# Altium PCB ARU8113 Testboard_V0.1.PcbDoc (part 1 of 3)
Units mil, origin at the board's own origin, x right, y up, seen from the top; angles counter-clockwise.
Board outline 6377.95 x 5157.48 mil, 4 copper layers (Top, PWR, GND, Bottom), stack 62.992 mil thick; 518 components, 350 nets, 1764 pads, 749 vias.
Unrouted connection lines stored in the file: 230.
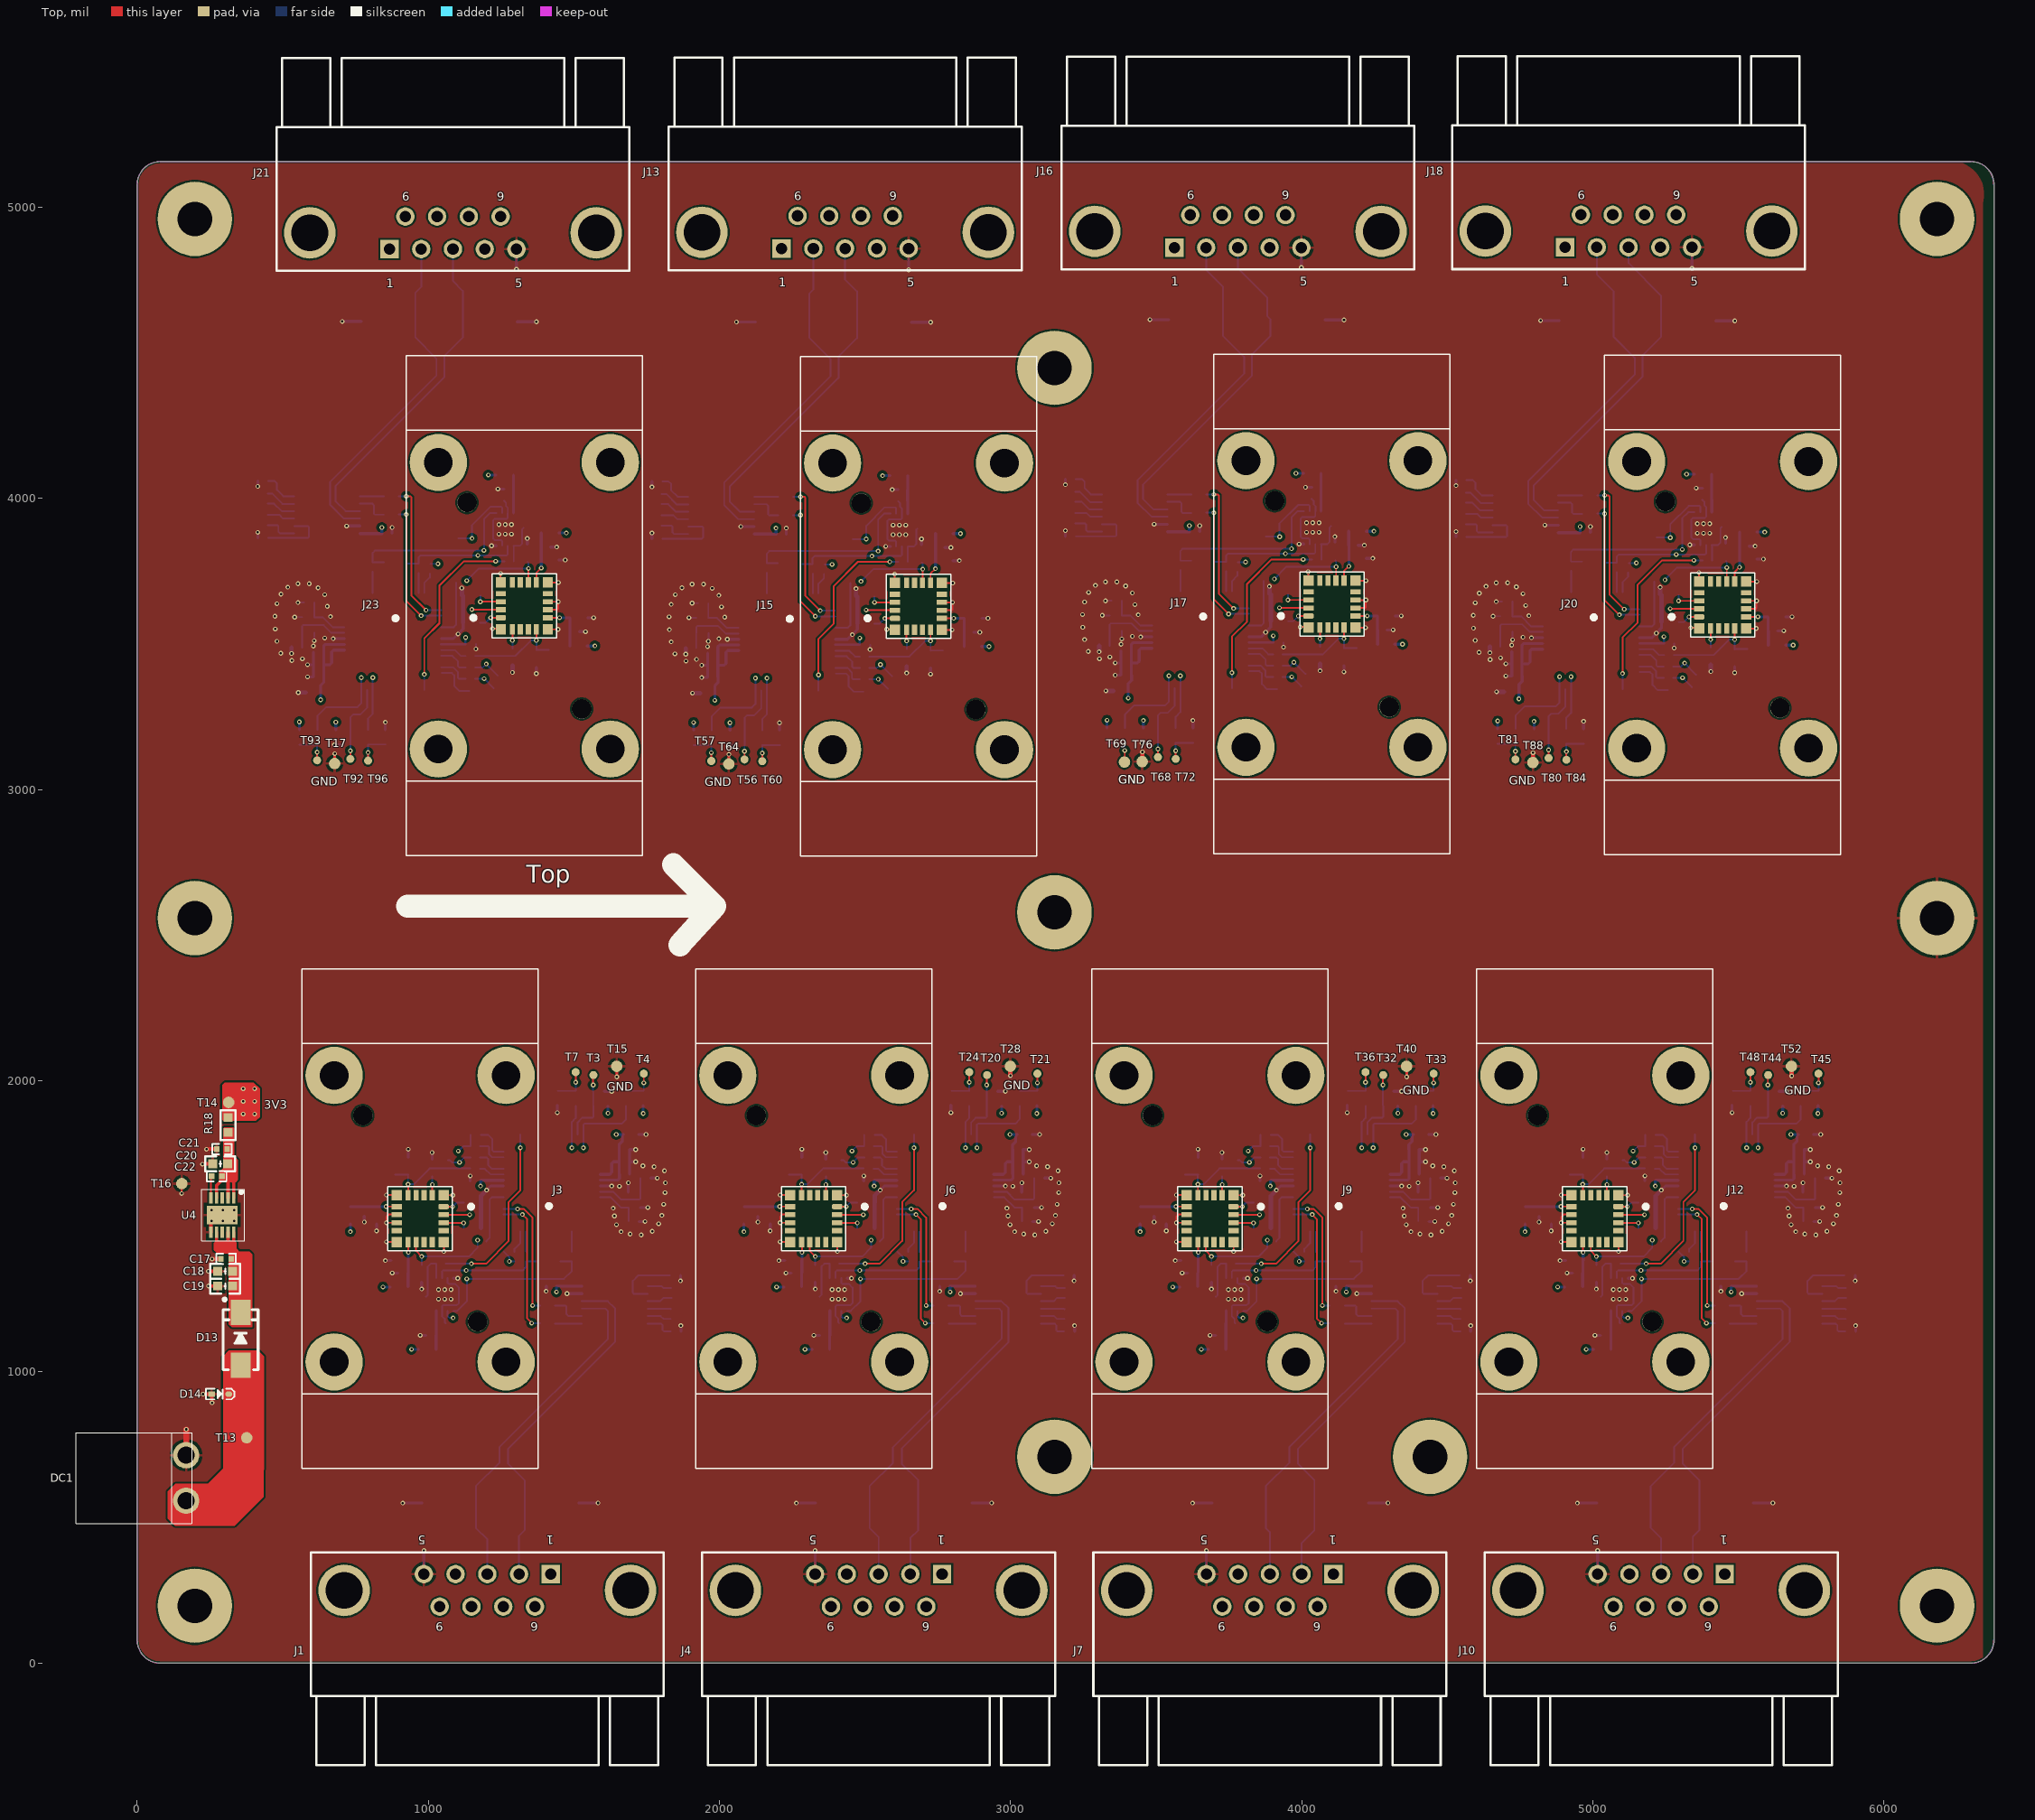
[diagram p0: Top view]
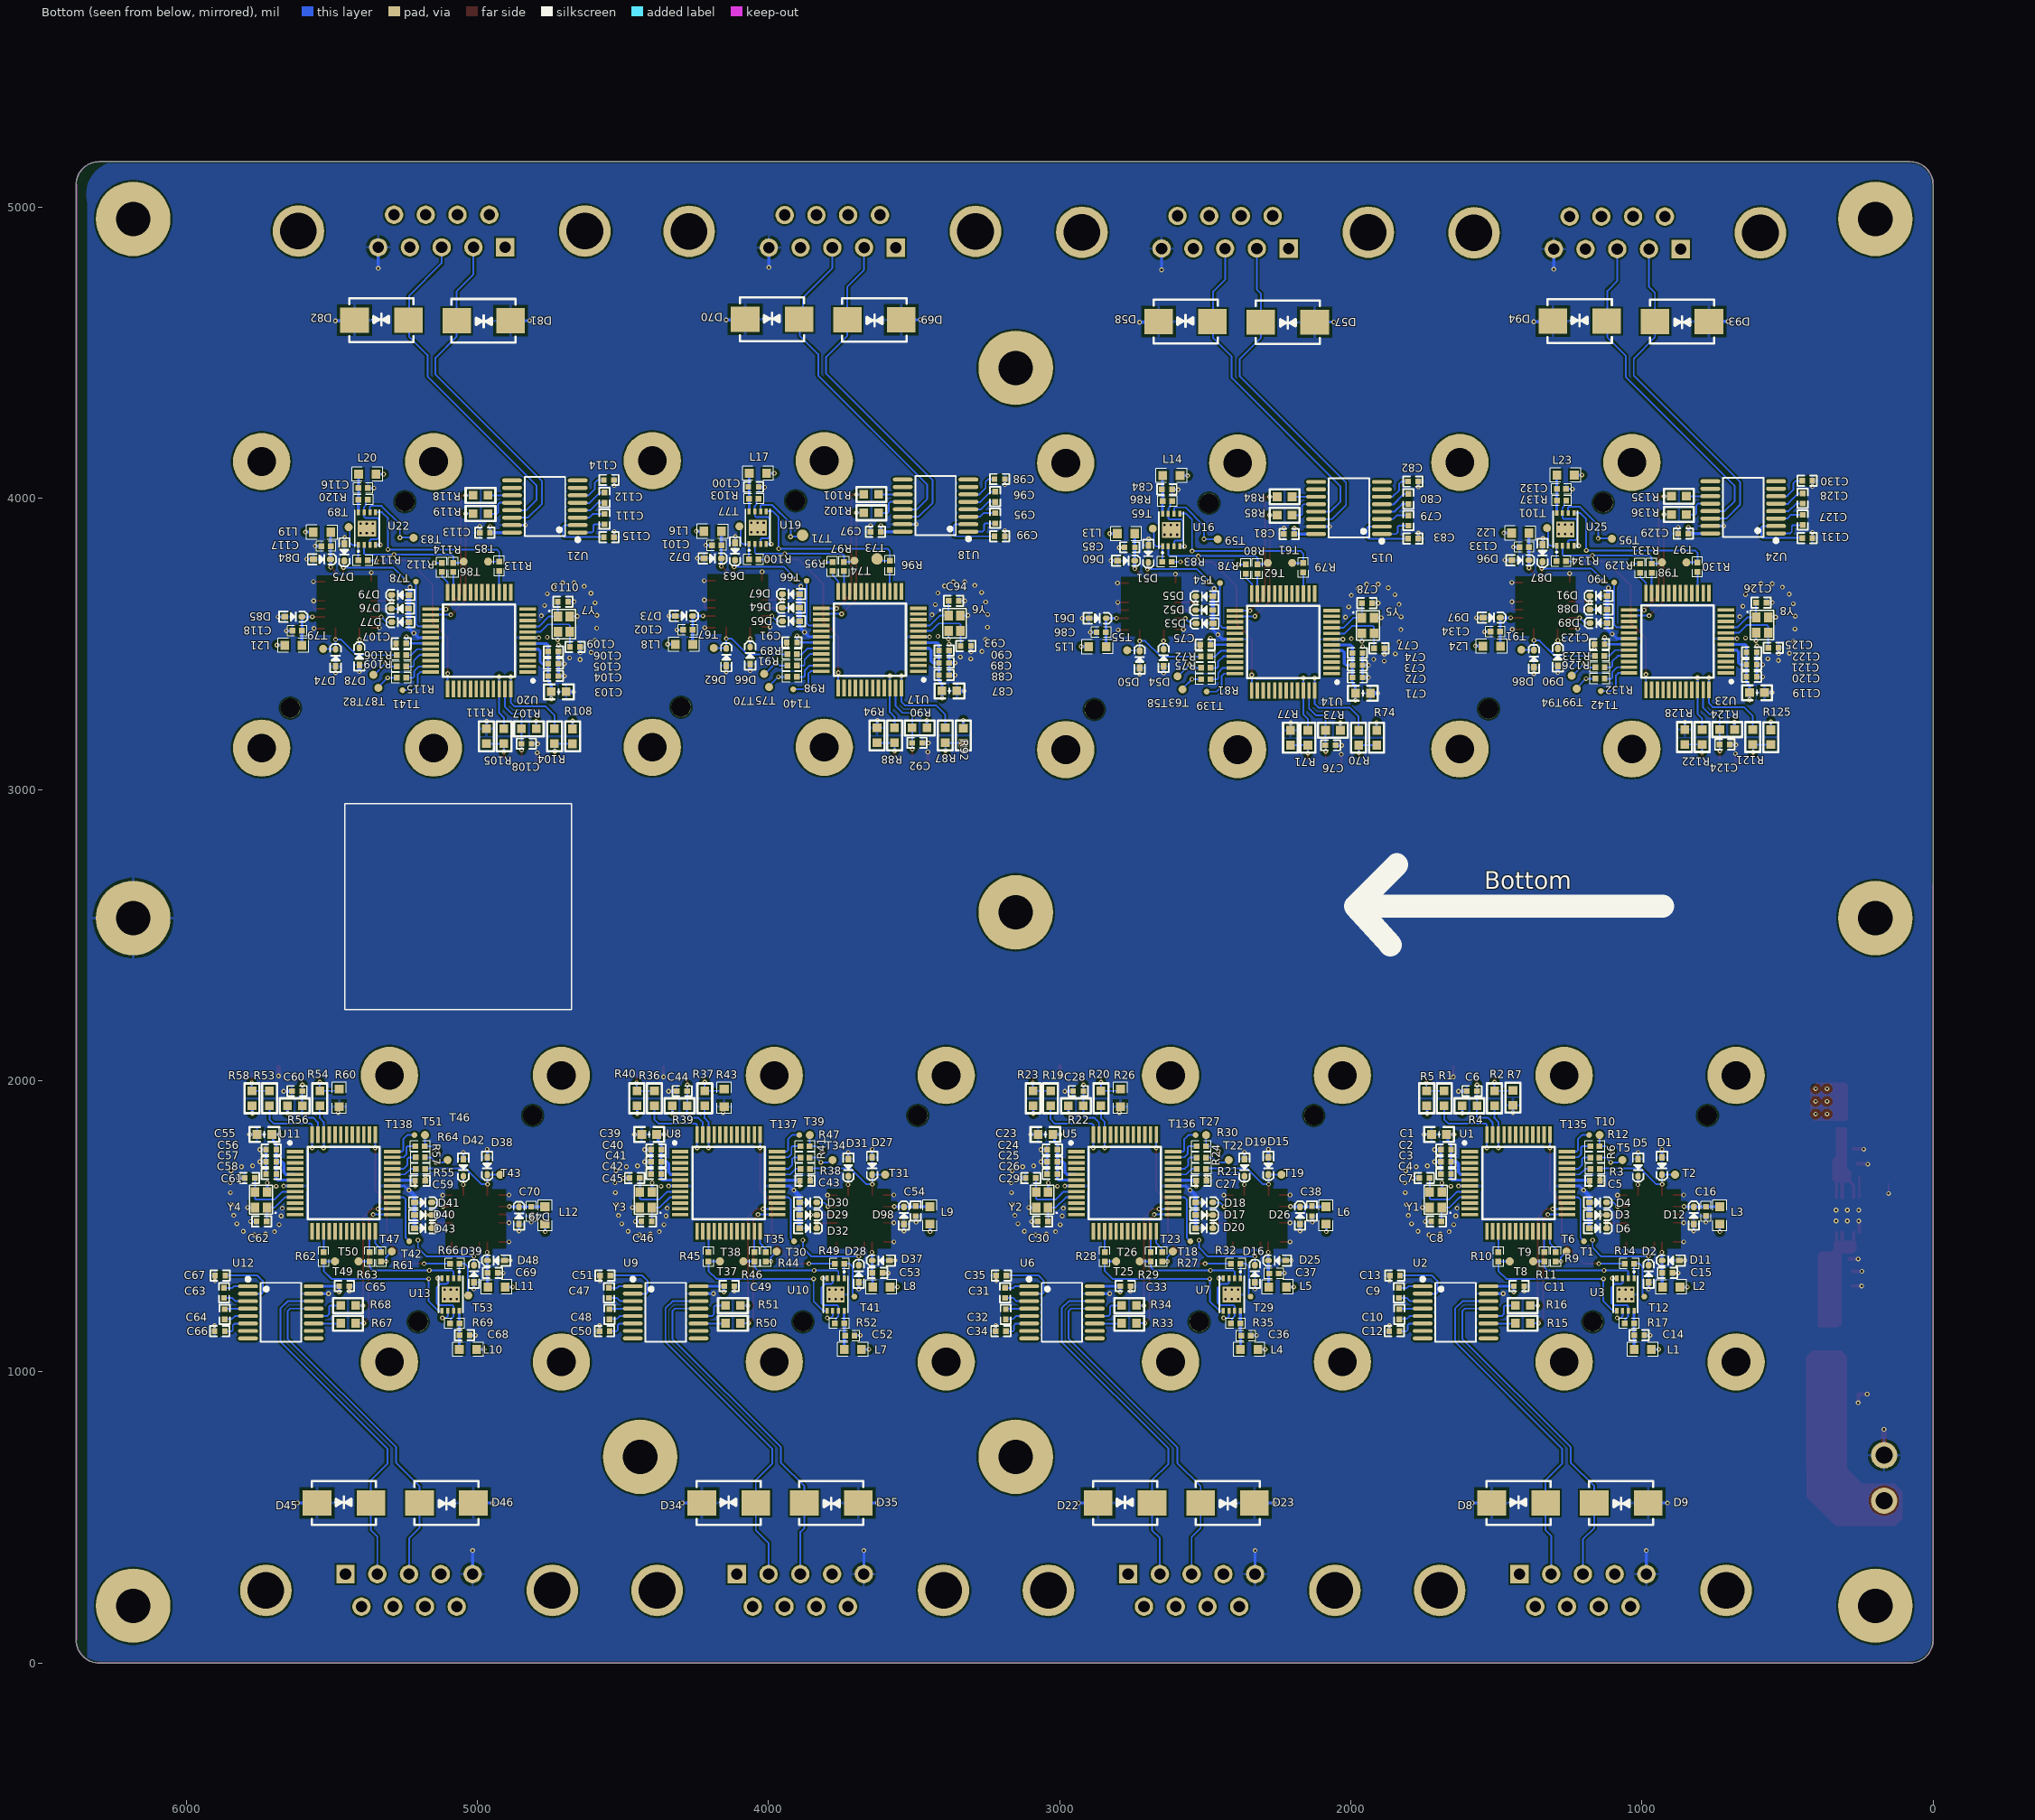
[diagram p1: Bottom view, seen from below]
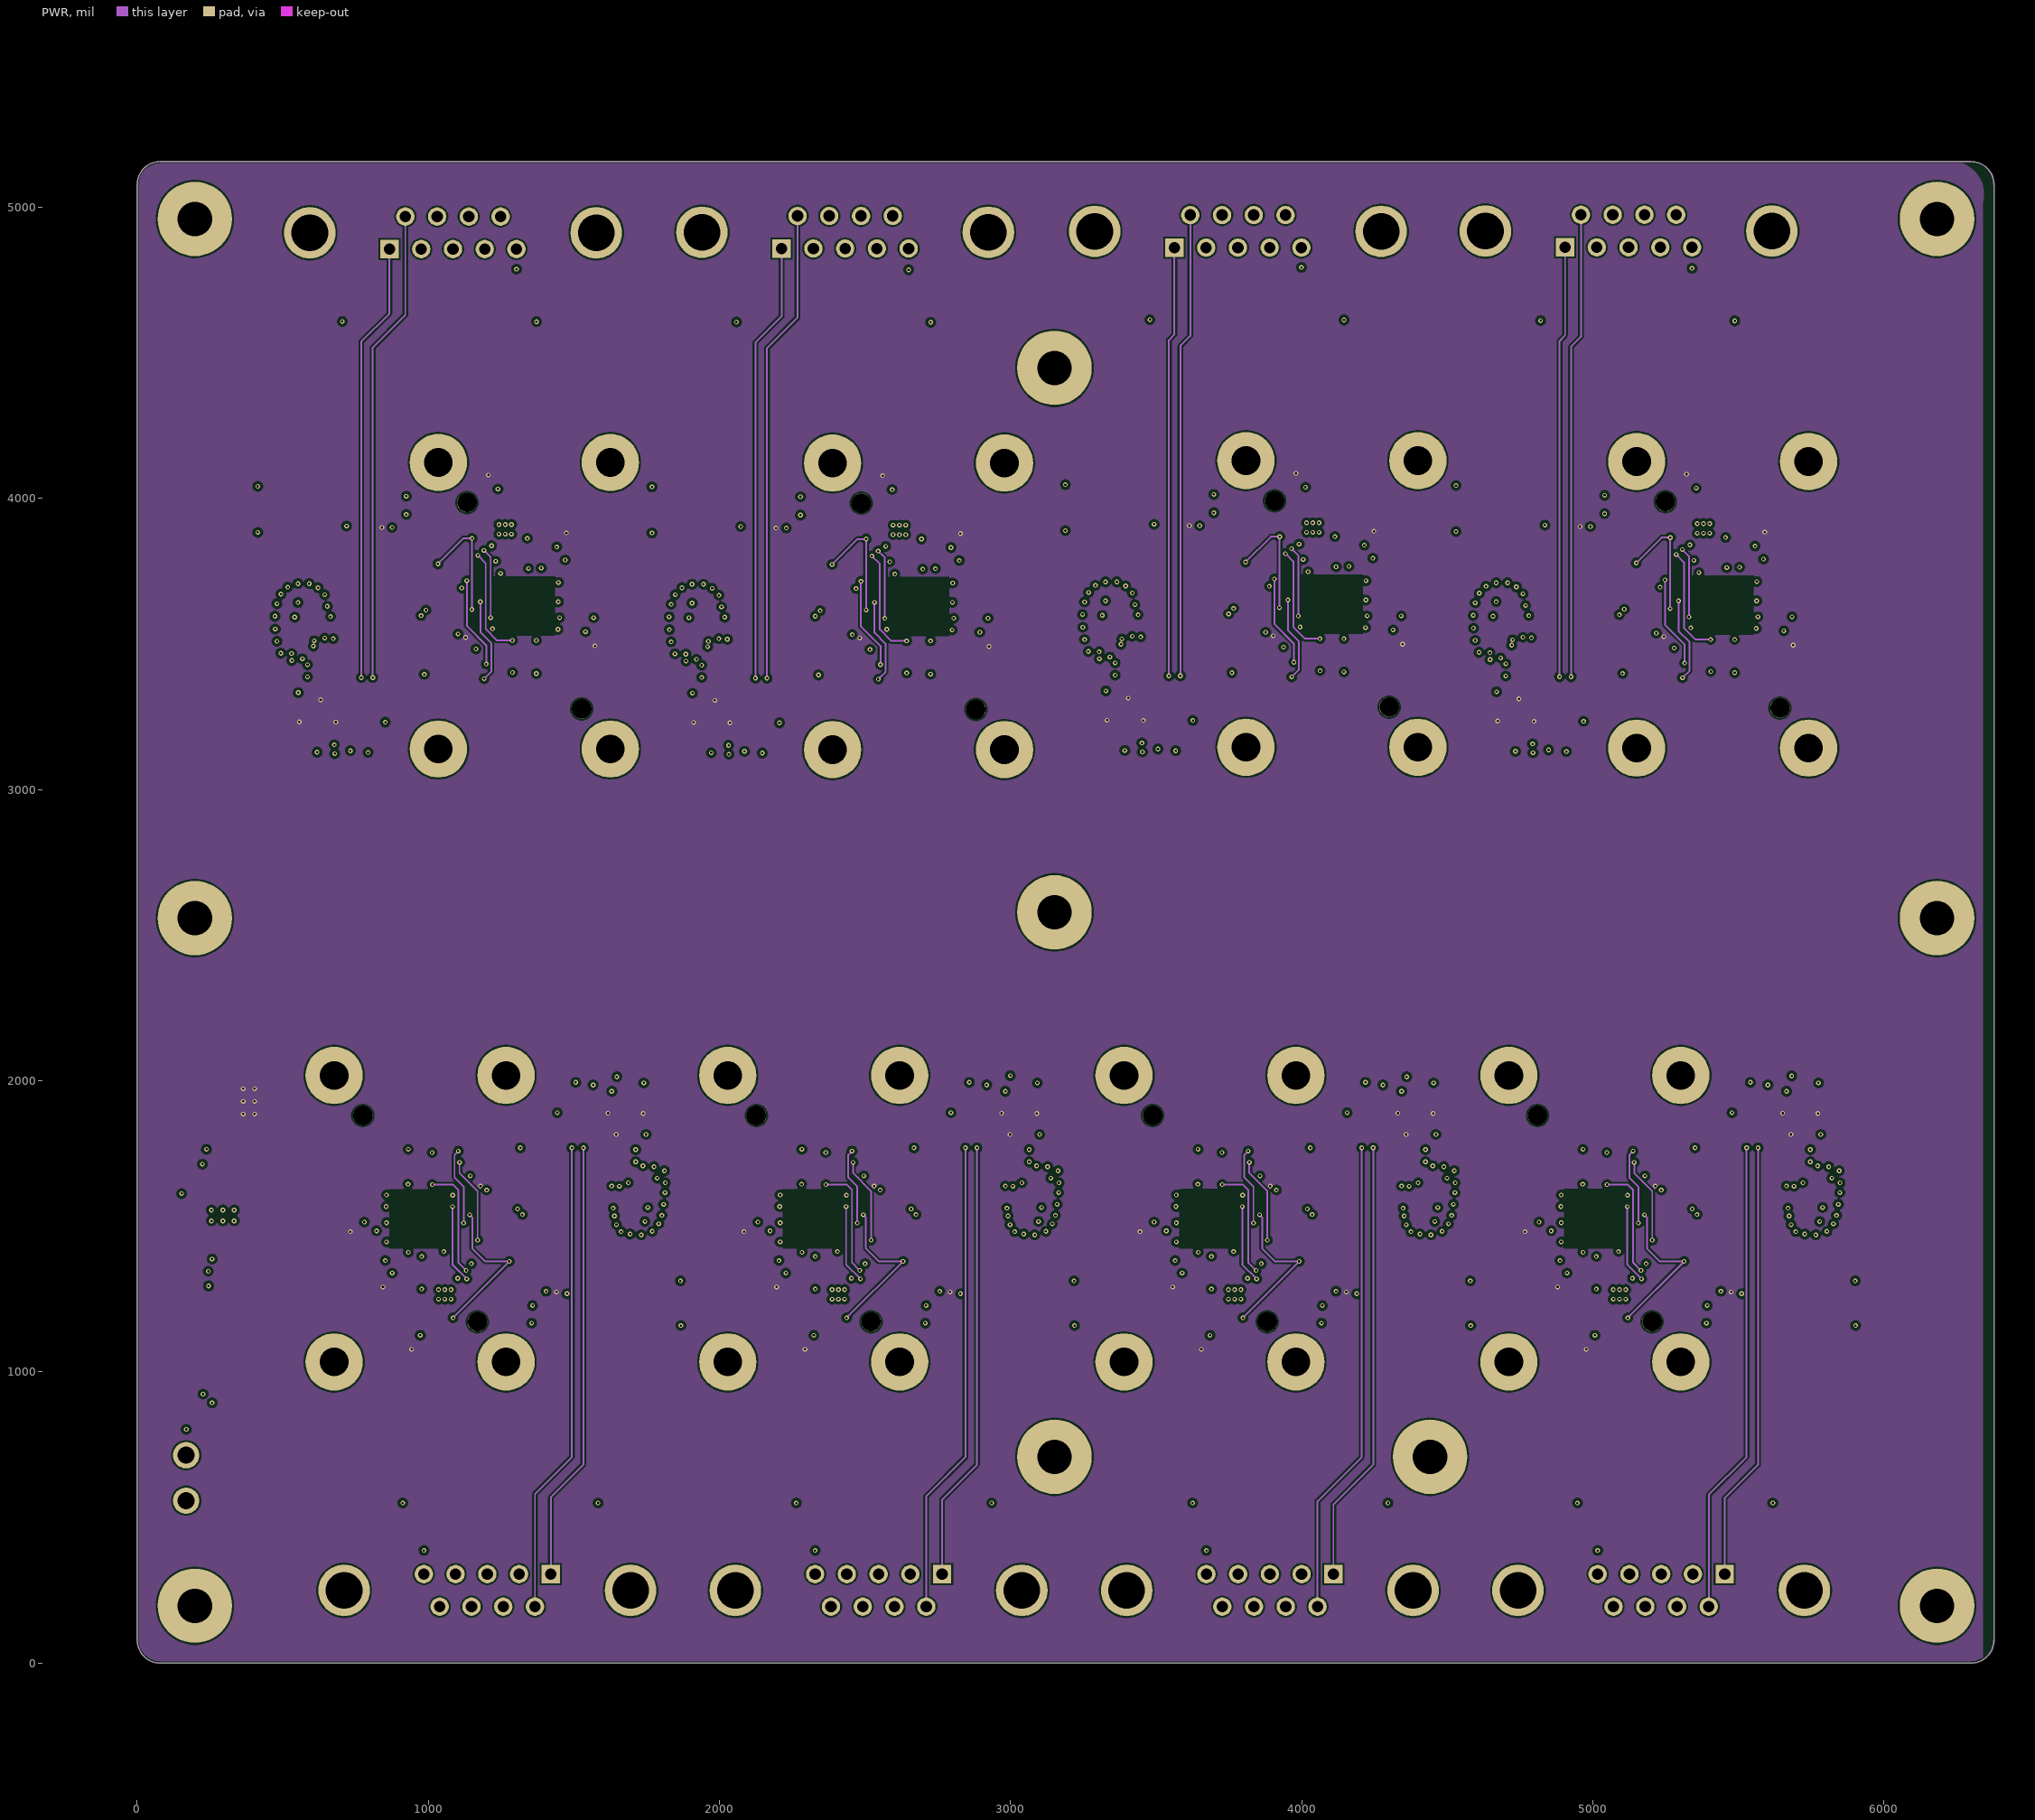
[diagram p2: PWR]
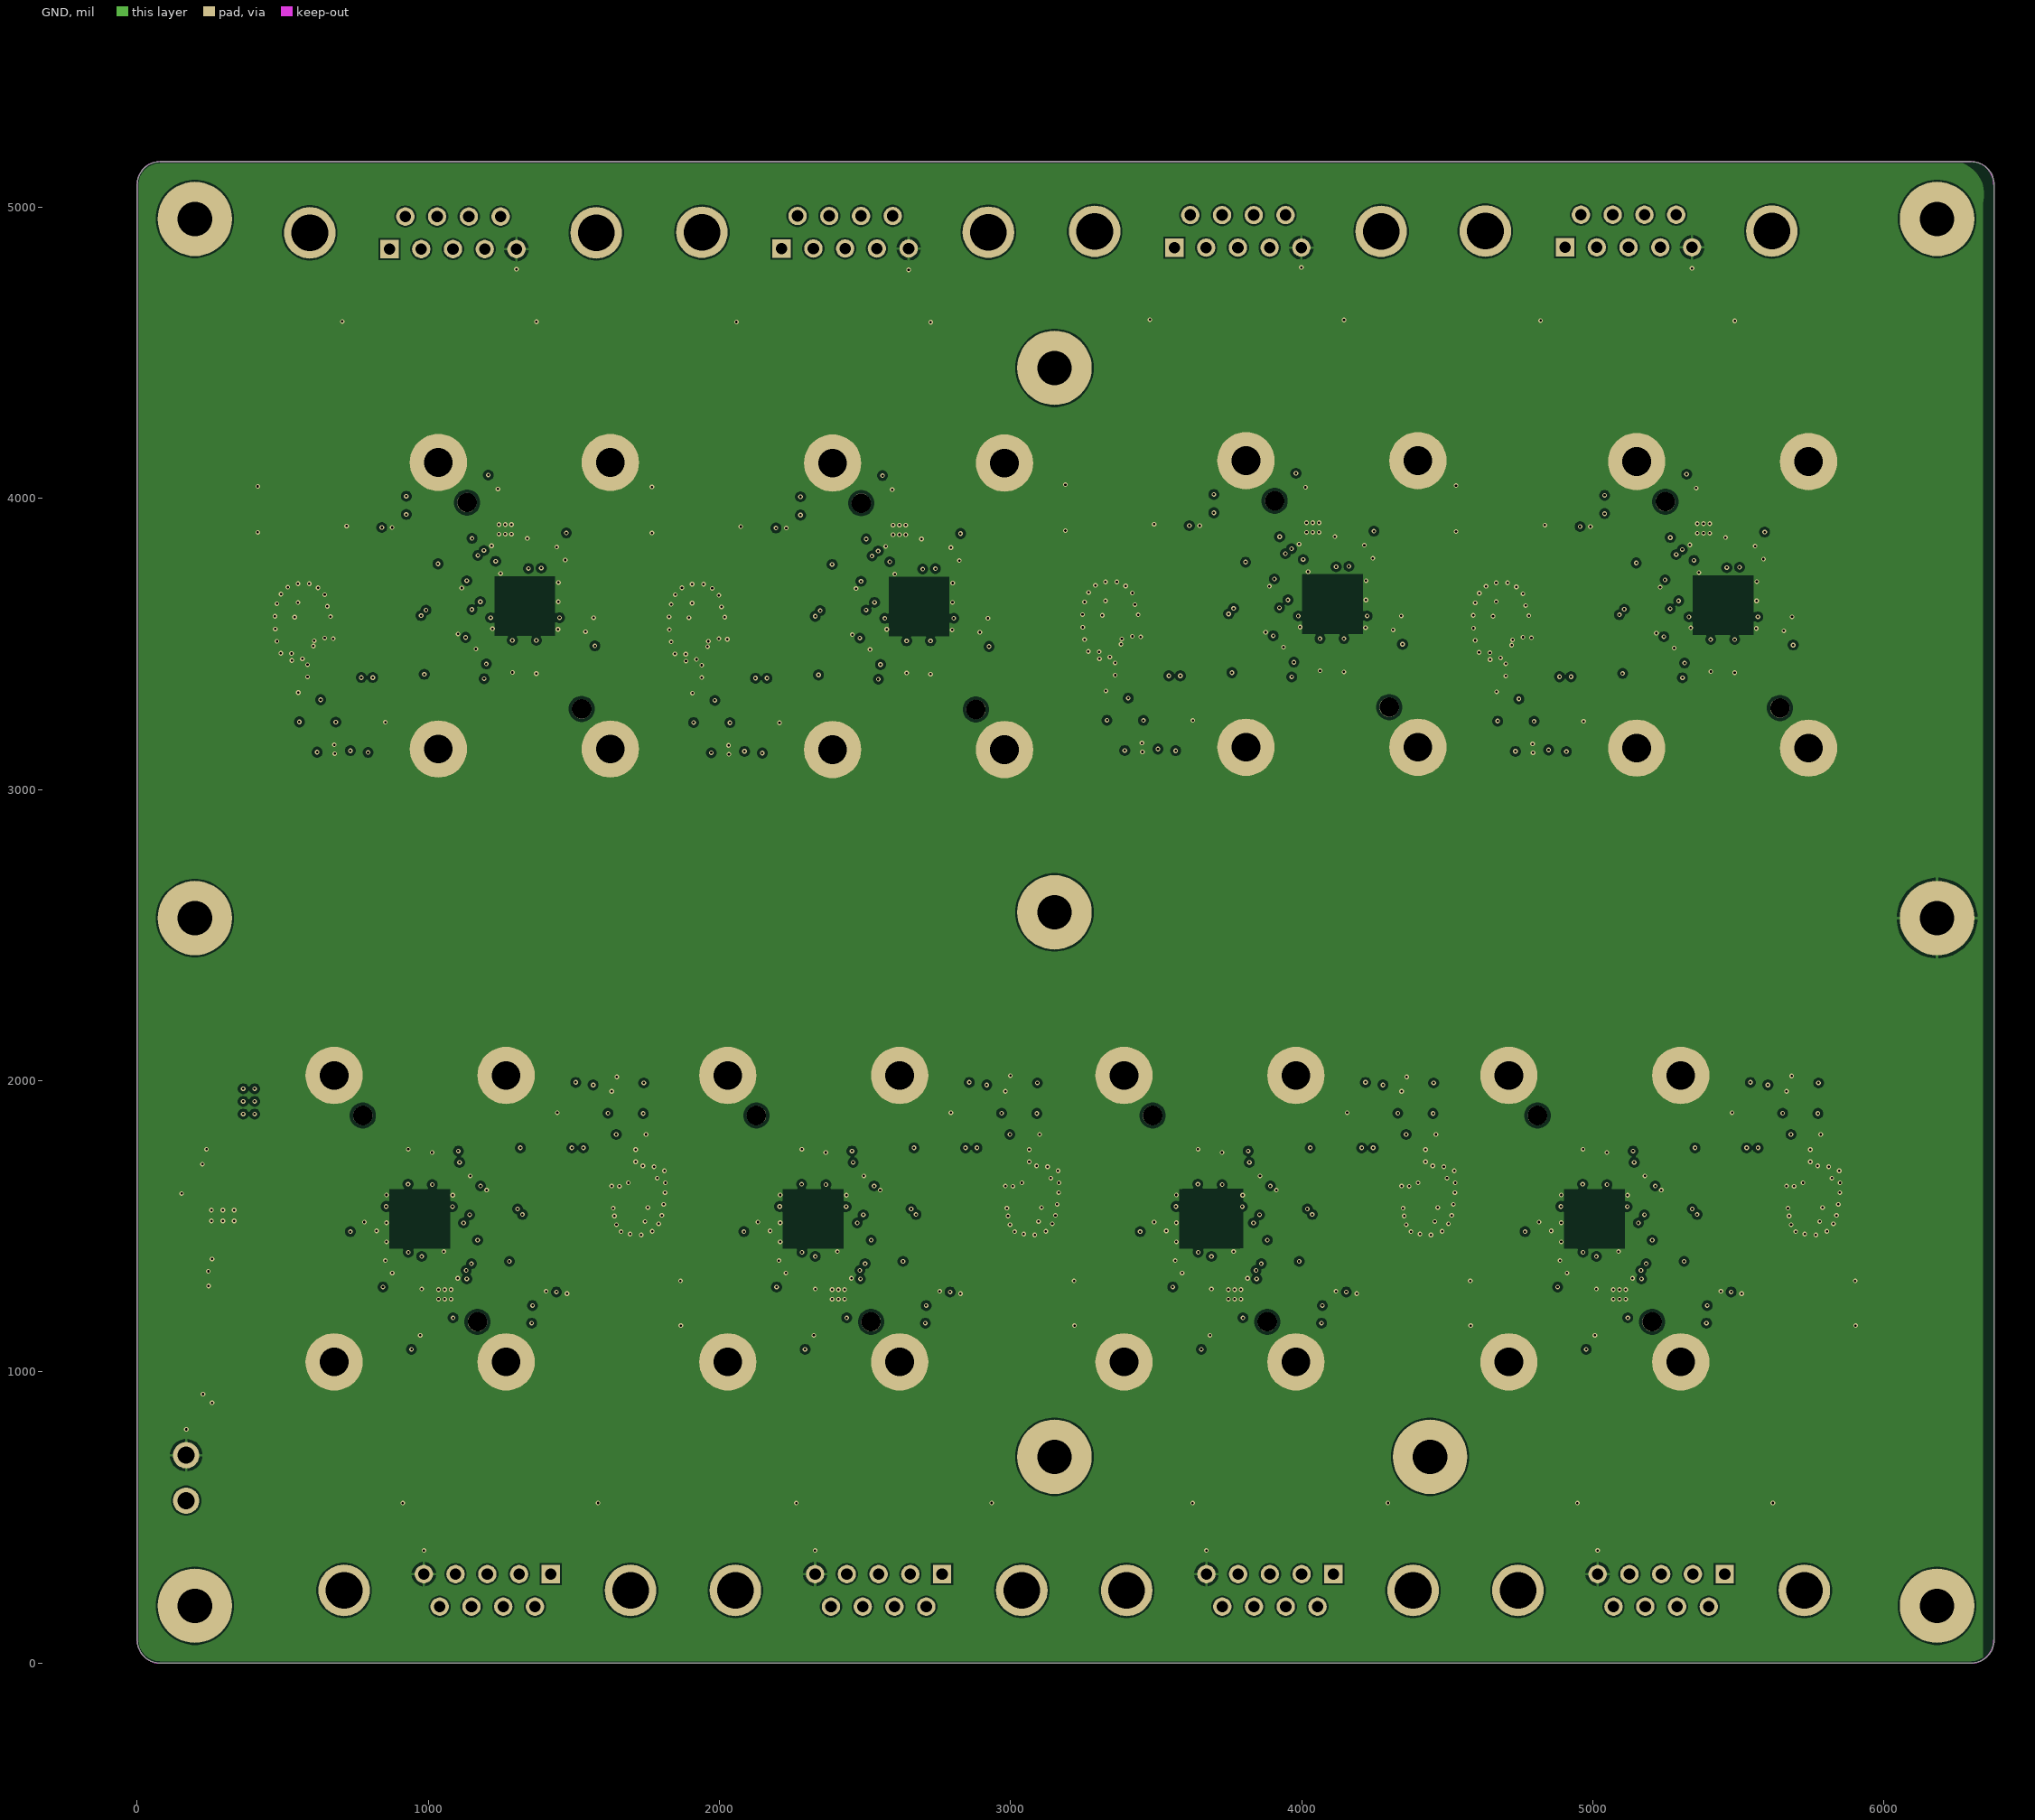
[diagram p3: GND]
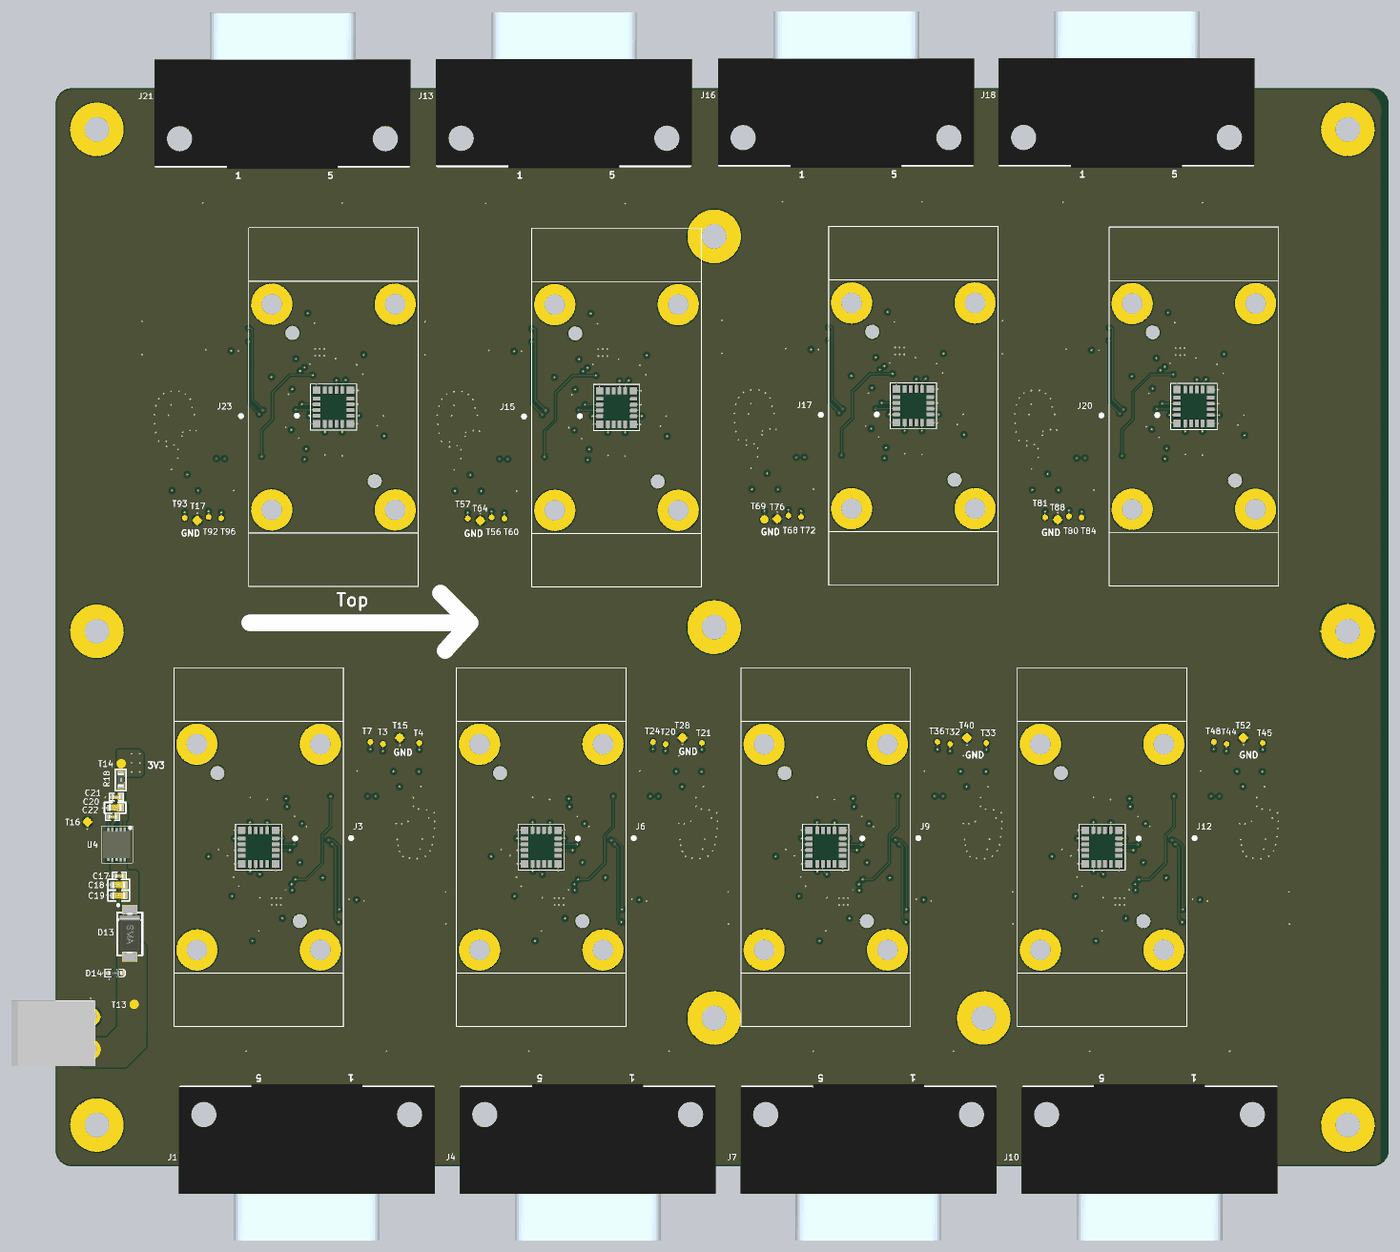
[diagram p6: 3D render of the assembled board from above, using the file's embedded part models]
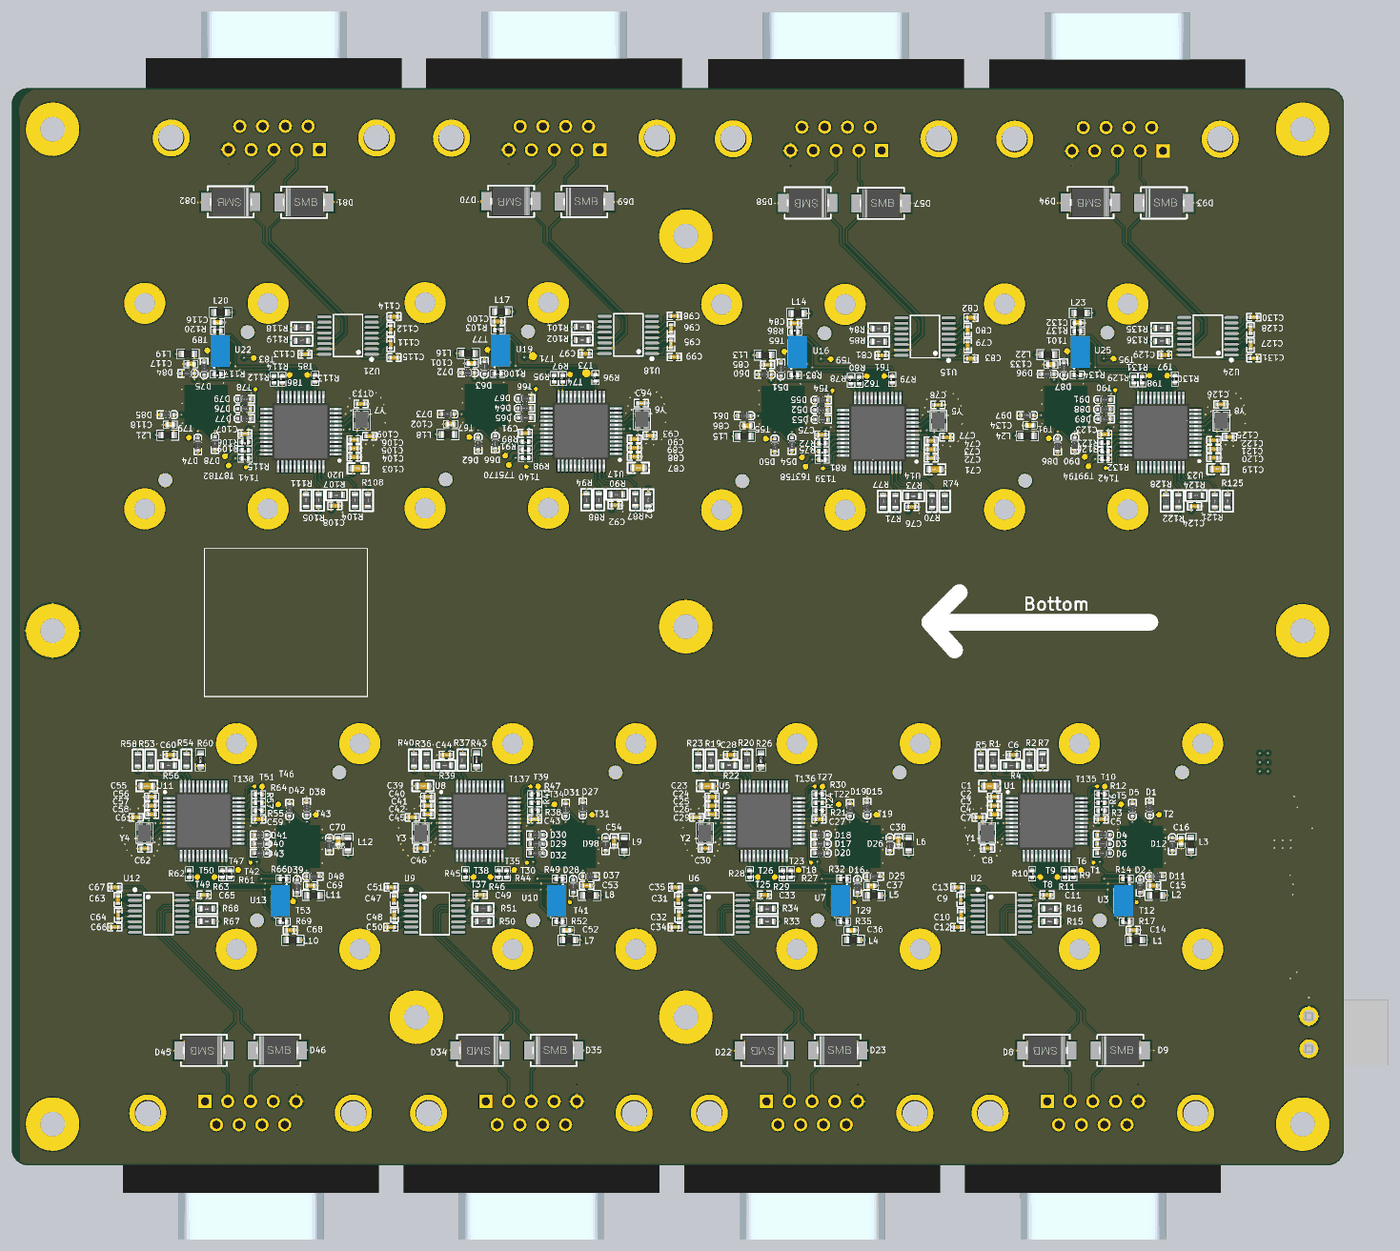
[diagram p7: 3D render of the assembled board from below, using the file's embedded part models]

## Layer stack, top to bottom
Top: signal copper 3.937
Dielectric 2: prepreg 3.937, PP-006, Dk 4.1
PWR: signal copper 3.937
Dielectric 1: dielectric 39.3701, FR-4, Dk 4.8
GND: signal copper 3.937
Dielectric 3: prepreg 3.937, PP-006, Dk 4.1
Bottom: signal copper 3.937

## Board outline
0.15,77.89 0.15,5077.89 cw(c78.89,5077.89) 78.89,5156.63 6299.36,5156.63 cw(c6299.36,5077.89) 6378.1,5077.89 6378.1,77.89 cw(c6299.36,77.89) 6299.36,-0.85 78.89,-0.85 cw(c78.89,77.89)

## Design rules (kind name [scope] priority, off if disabled: settings)
Clearance [All] p1: gap=6 ignorepadtopadclearanceinfootprint=TRUE except(10: Via-Fill Via-Poly Via-Region)
HoleSize [All] p1: absolutevalues=TRUE maxlimit=5000 minlimit=1 maxpercent=80.000 minpercent=20.000
HoleToHoleClearance [All] p1: gap=0 allowstackedmicrovias=TRUE
MinimumSolderMaskSliver [All] p1: minsoldermaskwidth=0
PlaneClearance [All] p1: clearance=7
PlaneConnect [All] p1: pad.planeconnectstyle=Relief pad.reliefexpansion=20 pad.reliefentries=4 pad.reliefconductorwidth=10 pad.reliefairgap=10 via.planeconnectstyle=Direct via.reliefexpansion=20 via.reliefentries=4 via.reliefconductorwidth=10 via.reliefairgap=10
PolygonConnect [All] p1: thpad.connectstyle=Relief thpad.reliefconductorwidth=10 thpad.reliefentries=4 thpad.polygonreliefangle="90 Angle" thpad.airgapwidth=10 smdpad.connectstyle=Relief smdpad.reliefconductorwidth=10 smdpad.reliefentries=4 smdpad.polygonreliefangle="90 Angle" smdpad.airgapwidth=10 via.connectstyle=Direct via.reliefconductorwidth=10 via.reliefentries=4 via.polygonreliefangle="90 Angle" via.airgapwidth=10
RoomDefinition RoomDefinition_4 [InComponentClass('09_test8') vs False] p1: confinementstyle=ConfineIn formatcopy=TRUE lockcomponents=FALSE outline 385.13,2760.1 1748.13,2760.1 1748.13,5529.1 385.13,5529.1
RoomDefinition [InComponentClass('02_test1') vs False] p2: confinementstyle=ConfineIn formatcopy=TRUE lockcomponents=FALSE outline 554.13,-367.9 1897.13,-367.9 1897.13,2396.1 554.13,2396.1
RoomDefinition RoomDefinition_7 [InComponentClass('08_test7') vs False] p3: confinementstyle=ConfineIn formatcopy=TRUE lockcomponents=FALSE outline 4501.13,2763.1 5864.13,2763.1 5864.13,5532.1 4501.13,5532.1
RoomDefinition RoomDefinition_6 [InComponentClass('07_test6') vs False] p4: confinementstyle=ConfineIn formatcopy=TRUE lockcomponents=FALSE outline 3159.13,2766.1 4522.13,2766.1 4522.13,5535.1 3159.13,5535.1
RoomDefinition RoomDefinition_5 [InComponentClass('06_test5') vs False] p5: confinementstyle=ConfineIn formatcopy=TRUE lockcomponents=FALSE outline 1739.13,2758.1 3102.13,2758.1 3102.13,5527.1 1739.13,5527.1
RoomDefinition RoomDefinition_3 [InComponentClass('05_test4') vs False] p6: confinementstyle=ConfineIn formatcopy=TRUE lockcomponents=FALSE outline 4589.13,-367.9 5932.13,-367.9 5932.13,2396.1 4589.13,2396.1
RoomDefinition RoomDefinition_2 [InComponentClass('04_test3') vs False] p7: confinementstyle=ConfineIn formatcopy=TRUE lockcomponents=FALSE outline 3267.13,-367.9 4610.13,-367.9 4610.13,2396.1 3267.13,2396.1
RoomDefinition RoomDefinition_1 [InComponentClass('03_test2') vs False] p8: confinementstyle=ConfineIn formatcopy=TRUE lockcomponents=FALSE outline 1906.13,-367.9 3249.13,-367.9 3249.13,2396.1 1906.13,2396.1
RoutingVias [All] p1: holewidth=28 width=50 viastyle="Through Hole" minholewidth=28 minwidth=50 maxholewidth=28 maxwidth=50
SilkToSilkClearance [All] p1: silktosilkclearance=0
SilkToSolderMaskClearance [IsPad] p1: minsilkscreentomaskgap=0 clearancetoexposedcopper=TRUE
SolderMaskExpansion [All] p1: expansion=2.5 istentingtop=FALSE
Width [All] p1: maxlimit=100 minlimit=4 preferedwidth=6
23 further rules are at their usual default settings.

## Classes and differential pairs
component class 09_test8: C119 C120 C121 C122 C123 C124 C125 C126 C127 C128 C129 C130 C131 C132 C133 C134 D86 D87 D88 D89 D90 D91 D93 D94 D96 D97 J21 J23 L22 L23 L24 R121 R122 R123 R124 R125 R126 R128 R129 R130 R131 R132 R134 R135 R136 R137 T90 T91 T92 T93 T94 T95 T96 T97 T98 T99 T101 T142 U23 U24 U25 Y8
component class 08_test7: C103 C104 C105 C106 C107 C108 C109 C110 C111 C112 C113 C114 C115 C116 C117 C118 D74 D75 D76 D77 D78 D79 D81 D82 D84 D85 J18 J20 L19 L20 L21 R104 R105 R106 R107 R108 R109 R111 R112 R113 R114 R115 R117 R118 R119 R120 T78 T79 T80 T81 T82 T83 T84 T85 T86 T87 T89 T141 U20 U21 U22 Y7
component class 07_test6: C87 C88 C89 C90 C91 C92 C93 C94 C95 C96 C97 C98 C99 C100 C101 C102 D62 D63 D64 D65 D66 D67 D69 D70 D72 D73 J16 J17 L16 L17 L18 R87 R88 R89 R90 R91 R92 R94 R95 R96 R97 R98 R100 R101 R102 R103 T66 T67 T68 T69 T70 T71 T72 T73 T74 T75 T77 T140 U17 U18 U19 Y6
component class 06_test5: C71 C72 C73 C74 C75 C76 C77 C78 C79 C80 C81 C82 C83 C84 C85 C86 D50 D51 D52 D53 D54 D55 D57 D58 D60 D61 J13 J15 L13 L14 L15 R70 R71 R72 R73 R74 R75 R77 R78 R79 R80 R81 R83 R84 R85 R86 T54 T55 T56 T57 T58 T59 T60 T61 T62 T63 T65 T139 U14 U15 U16 Y5
component class "01_POWER ": C17 C18 C19 C20 C21 C22 D13 D14 DC1 R18 T13 T14 T15 T16 T17 U4
component class 05_test4: C55 C56 C57 C58 C59 C60 C61 C62 C63 C64 C65 C66 C67 C68 C69 C70 D38 D39 D40 D41 D42 D43 D45 D46 D48 D49 J10 J12 L10 L11 L12 R53 R54 R55 R56 R57 R58 R60 R61 R62 R63 R64 R66 R67 R68 R69 T42 T43 T44 T45 T46 T47 T48 T49 T50 T51 T53 T138 U11 U12 U13 Y4
component class 04_test3: C39 C40 C41 C42 C43 C44 C45 C46 C47 C48 C49 C50 C51 C52 C53 C54 D27 D28 D29 D30 D31 D32 D34 D35 D37 D98 J7 J9 L7 L8 L9 R36 R37 R38 R39 R40 R41 R43 R44 R45 R46 R47 R49 R50 R51 R52 T30 T31 T32 T33 T34 T35 T36 T37 T38 T39 T41 T137 U8 U9 U10 Y3
component class 03_test2: C23 C24 C25 C26 C27 C28 C29 C30 C31 C32 C33 C34 C35 C36 C37 C38 D15 D16 D17 D18 D19 D20 D22 D23 D25 D26 J4 J6 L4 L5 L6 R19 R20 R21 R22 R23 R24 R26 R27 R28 R29 R30 R32 R33 R34 R35 T18 T19 T20 T21 T22 T23 T24 T25 T26 T27 T29 T136 U5 U6 U7 Y2
component class 02_test1: C1 C2 C3 C4 C5 C6 C7 C8 C9 C10 C11 C12 C13 C14 C15 C16 D1 D2 D3 D4 D5 D6 D8 D9 D11 D12 J1 J3 L1 L2 L3 R1 R2 R3 R4 R5 R6 R7 R9 R10 R11 R12 R14 R15 R16 R17 T1 T2 T3 T4 T5 T6 T7 T8 T9 T10 T12 T135 U1 U2 U3 Y1

## Components (designator, comment, footprint, x,y, rotation, side; value= is the part's Value field where it differs from the comment)
C1 "10uF/16V/0603" "C 0603_L" 1696.59,1815 r0 bottom value=10uF/16V
C2 "10nF/16V/0402" "C 0402_L" 1673,1763 r180 bottom
C3 "100nF/16V/0402" "C 0402_L" 1673,1721 r0 bottom
C4 "100nF/16V/0402" "C 0402_L" 1673,1679 r0 bottom
C5 "100nF/16V/0402" "C 0402_L" 1161.43,1655.65 r180 bottom
C6 "100nF/16V/0402" "C 0402_L" 1584,1964 r0 bottom
C7 "10pF/50V/0402" "C 0402_L" 1747,1665 r180 bottom
C8 "10pF/50V/0402" "C 0402_L" 1706,1516 r180 bottom
C9 "100nF/16V/0402" "C 0402_L" 1835,1271 r90 bottom
C10 "100nF/16V/0402" "C 0402_L" 1833,1197 r270 bottom
C11 "Cap" "C 0402_L" 1422,1294 r180 bottom value=100nF/16V/0402
C12 "100nF/16V/0402" "C 0402_L" 1850,1139.29 r0 bottom
C13 "100nF/16V/0402" "C 0402_L" 1848.29,1330 r0 bottom
C14 "100nF/16V/0402" "C 0402_L" 1009,1125 r0 bottom
C15 "100nF/16V/0402" "C 0402_L" 912.28,1339 r180 bottom
C16 "100nF/16V/0402" 0402C 779.96,1550.63 r270 bottom
C17 "100nF/16V/0402" "C 0402_L" 305.13,1388.1 r180 top value=10uF/16V
C18 "10uF/16V/0603" "C 0603_L" 302.13,1345.1 r180 top value=10uF/16V
C19 "10uF/16V/0603" "C 0603_L" 302.13,1294.1 r180 top value=10uF/16V
C20 "10uF/16V/0603" "C 0603_L" 285.13,1714.1 r180 top value=10uF/16V
C21 "100nF/16V/0402" "C 0402_L" 291.13,1765.1 r180 top value=10uF/16V
C22 "10nF/16V/0402" "C 0402_L" 273.13,1671.1 r180 top
C23 "10uF/16V/0603" "C 0603_L" 3048.59,1815 r0 bottom value=10uF/16V
C24 "10nF/16V/0402" "C 0402_L" 3025,1763 r180 bottom
C25 "100nF/16V/0402" "C 0402_L" 3025,1721 r0 bottom
C26 "100nF/16V/0402" "C 0402_L" 3025,1679 r0 bottom
C27 "100nF/16V/0402" "C 0402_L" 2513.43,1655.65 r180 bottom
C28 "100nF/16V/0402" "C 0402_L" 2936,1964 r0 bottom
C29 "10pF/50V/0402" "C 0402_L" 3099,1665 r180 bottom
C30 "10pF/50V/0402" "C 0402_L" 3058,1516 r180 bottom
C31 "100nF/16V/0402" "C 0402_L" 3187,1271 r90 bottom value=100nF/16V/0603
C32 "100nF/16V/0402" "C 0402_L" 3185,1197 r270 bottom value=100nF/16V/0603
C33 "100nF/16V/0402" "C 0402_L" 2774,1294 r180 bottom value=100nF/16V/0603
C34 "100nF/16V/0402" "C 0402_L" 3202,1139.29 r0 bottom value=100nF/16V/0603
C35 "100nF/16V/0402" "C 0402_L" 3200.29,1330 r0 bottom value=100nF/16V/0603
C36 "100nF/16V/0402" 0402C 2359.78,1123.67 r0 bottom
C37 "100nF/16V/0402" 0402C 2263.15,1337.19 r180 bottom
C38 "100nF/16V/0402" "C 0402_L" 2133.29,1551.76 r270 bottom
C39 "10uF/16V/0603" "C 0603_L" 4409.59,1815 r0 bottom value=10uF/16V
C40 "10nF/16V/0402" "C 0402_L" 4386,1763 r180 bottom
C41 "100nF/16V/0402" "C 0402_L" 4386,1721 r0 bottom
C42 "100nF/16V/0402" "C 0402_L" 4386,1679 r0 bottom
C43 "100nF/16V/0402" "C 0402_L" 3874.43,1655.65 r180 bottom
C44 "100nF/16V/0402" "C 0402_L" 4297,1964 r0 bottom
C45 "10pF/50V/0402" "C 0402_L" 4460,1665 r180 bottom
C46 "10pF/50V/0402" "C 0402_L" 4419,1516 r180 bottom
C47 "Cap" "C 0402_L" 4548,1271 r90 bottom value=100nF/16V/0402
C48 "Cap" "C 0402_L" 4546,1197 r270 bottom value=100nF/16V/0402
C49 "Cap" "C 0402_L" 4135,1294 r180 bottom value=100nF/16V/0402
C50 "Cap" "C 0402_L" 4563,1139.29 r0 bottom value=100nF/16V/0402
C51 "Cap" "C 0402_L" 4561.29,1330 r0 bottom value=100nF/16V/0402
C52 "100nF/16V/0402" 0402C 3720.78,1123.67 r0 bottom
C53 "100nF/16V/0402" "C 0402_L" 3625.28,1339 r180 bottom
C54 "100nF/16V/0402" "C 0402_L" 3494.29,1551.76 r270 bottom
C55 "10uF/16V/0603" "C 0603_L" 5731.59,1815 r0 bottom value=10uF/16V
C56 "10nF/16V/0402" "C 0402_L" 5708,1763 r180 bottom
C57 "100nF/16V/0402" "C 0402_L" 5708,1721 r0 bottom
C58 "100nF/16V/0402" "C 0402_L" 5708,1679 r0 bottom
C59 "100nF/16V/0402" "C 0402_L" 5196.43,1655.65 r180 bottom
C60 "100nF/16V/0402" "C 0402_L" 5619,1964 r0 bottom
C61 "10pF/50V/0402" "C 0402_L" 5782,1665 r180 bottom
C62 "10pF/50V/0402" "C 0402_L" 5741,1516 r180 bottom
C63 "Cap" "C 0402_L" 5870,1271 r90 bottom value=100nF/16V/0402
C64 "Cap" "C 0402_L" 5868,1197 r270 bottom value=100nF/16V/0402
C65 "Cap" "C 0402_L" 5457,1294 r180 bottom value=100nF/16V/0402
C66 "Cap" "C 0402_L" 5885,1139.29 r0 bottom value=100nF/16V/0402
C67 "Cap" "C 0402_L" 5883.29,1330 r0 bottom value=100nF/16V/0402
C68 "100nF/16V/0402" "C 0402_L" 5044,1125 r0 bottom
C69 "100nF/16V/0402" "C 0402_L" 4947.28,1339 r180 bottom
C70 "100nF/16V/0402" 0402C 4814.96,1550.63 r270 bottom
C71 "10uF/16V/0603" "C 0603_L" 1958.41,3330.72 r180 bottom value=10uF/16V
C72 "10nF/16V/0402" "C 0402_L" 1977,3384.71 r0 bottom
C73 "100nF/16V/0402" "C 0402_L" 1977,3426.71 r180 bottom
C74 "100nF/16V/0402" "C 0402_L" 1977,3468.71 r180 bottom
C75 "100nF/16V/0402" "C 0402_L" 2499.58,3497 r0 bottom
C76 "100nF/16V/0402" "C 0402_L" 2069.28,3152 r180 bottom
C77 "10pF/50V/0402" "C 0402_L" 1902.29,3485 r0 bottom
C78 "10pF/50V/0402" "C 0402_L" 1944,3640 r0 bottom
C79 "Cap" "C 0402_L" 1801.74,3923.67 r270 bottom value=100nF/16V/0402
C80 "Cap" "C 0402_L" 1801.75,3997.67 r90 bottom value=100nF/16V/0402
C81 "Cap" "C 0402_L" 2212,3877 r0 bottom value=100nF/16V/0402
C82 "Cap" "C 0402_L" 1786,4058 r180 bottom value=100nF/16V/0402
C83 "Cap" "C 0402_L" 1786,3861.67 r180 bottom value=100nF/16V/0402
C84 "100nF/16V/0402" "C 0402_L" 2631.36,4031.33 r0 bottom
C85 "100nF/16V/0402" "C 0402_L" 2759.1,3831.83 r0 bottom
C86 "100nF/16V/0402" 0402C 2857,3540 r0 bottom
C87 "10uF/16V/0603" "C 0603_L" 3378.41,3338.72 r180 bottom value=10uF/16V
C88 "10nF/16V/0402" "C 0402_L" 3397,3392.71 r0 bottom
C89 "100nF/16V/0402" "C 0402_L" 3397,3434.71 r180 bottom
C90 "100nF/16V/0402" "C 0402_L" 3397,3476.71 r180 bottom
C91 "100nF/16V/0402" "C 0402_L" 3919.58,3505 r0 bottom
C92 "100nF/16V/0402" "C 0402_L" 3489.28,3160 r180 bottom
C93 "10pF/50V/0402" "C 0402_L" 3322.29,3493 r0 bottom
C94 "10pF/50V/0402" "C 0402_L" 3364,3648 r0 bottom
C95 "Cap" "C 0402_L" 3221.74,3931.67 r270 bottom value=100nF/16V/0402
C96 "Cap" "C 0402_L" 3221.75,4005.67 r90 bottom value=100nF/16V/0402
C97 "Cap" "C 0402_L" 3632,3885 r0 bottom value=100nF/16V/0402
C98 "Cap" "C 0402_L" 3206,4066 r180 bottom value=100nF/16V/0402
C99 "Cap" "C 0402_L" 3206,3869.67 r180 bottom value=100nF/16V/0402
C100 "100nF/16V/0402" "C 0402_L" 4051.36,4039.33 r0 bottom
C101 "100nF/16V/0402" 0402C 4177.88,3838.5 r0 bottom
C102 "100nF/16V/0402" 0402C 4277,3548 r0 bottom
C103 "10uF/16V/0603" "C 0603_L" 4720.41,3335.72 r180 bottom value=10uF/16V
C104 "10nF/16V/0402" "C 0402_L" 4739,3389.71 r0 bottom
C105 "100nF/16V/0402" "C 0402_L" 4739,3431.71 r180 bottom
C106 "100nF/16V/0402" "C 0402_L" 4739,3473.71 r180 bottom
C107 "100nF/16V/0402" "C 0402_L" 5261.58,3502 r0 bottom
C108 "100nF/16V/0402" "C 0402_L" 4831.28,3157 r180 bottom
C109 "10pF/50V/0402" "C 0402_L" 4664.29,3490 r0 bottom
C110 "10pF/50V/0402" "C 0402_L" 4706,3645 r0 bottom
C111 "Cap" "C 0402_L" 4563.74,3928.67 r270 bottom value=100nF/16V/0402
C112 "Cap" "C 0402_L" 4563.75,4002.67 r90 bottom value=100nF/16V/0402
C113 "Cap" "C 0402_L" 4974,3882 r0 bottom value=100nF/16V/0402
C114 "Cap" "C 0402_L" 4548,4063 r180 bottom value=100nF/16V/0402
C115 "Cap" "C 0402_L" 4548,3866.67 r180 bottom value=100nF/16V/0402
C116 "100nF/16V/0402" 0402C 5392.14,4035 r0 bottom
C117 "100nF/16V/0402" 0402C 5519.88,3835.5 r0 bottom
C118 "100nF/16V/0402" 0402C 5619,3545 r0 bottom
C119 "10uF/16V/0603" "C 0603_L" 604.41,3332.72 r180 bottom value=10uF/16V
C120 "10nF/16V/0402" "C 0402_L" 623,3386.71 r0 bottom
C121 "100nF/16V/0402" "C 0402_L" 623,3428.71 r180 bottom
C122 "100nF/16V/0402" "C 0402_L" 623,3470.71 r180 bottom
C123 "100nF/16V/0402" "C 0402_L" 1145.58,3499 r0 bottom
C124 "100nF/16V/0402" "C 0402_L" 715.28,3154 r180 bottom
C125 "10pF/50V/0402" "C 0402_L" 548.29,3487 r0 bottom
C126 "10pF/50V/0402" "C 0402_L" 590,3642 r0 bottom
C127 "Cap" "C 0402_L" 447.74,3925.67 r270 bottom value=100nF/16V/0402
C128 "Cap" "C 0402_L" 447.75,3999.67 r90 bottom value=100nF/16V/0402
C129 "Cap" "C 0402_L" 858,3879 r0 bottom value=100nF/16V/0402
C130 "Cap" "C 0402_L" 432,4060 r180 bottom value=100nF/16V/0402
C131 "Cap" "C 0402_L" 432,3863.67 r180 bottom value=100nF/16V/0402
C132 "100nF/16V/0402" 0402C 1276.14,4032 r0 bottom
C133 "100nF/16V/0402" 0402C 1403.88,3832.5 r0 bottom
C134 "100nF/16V/0402" 0402C 1503,3542 r0 bottom
D1 "PESD3V3U1UB,115" SOD-523 931,1706.53 r270 bottom
D2 "PESD3V3U1UB,115" SOD-523 977,1336.53 r90 bottom
D3 "PESD3V3U1UB,115" SOD-523 1151,1538 r180 bottom
D4 "PESD3V3U1UB,115" SOD-523 1151,1581 r180 bottom
D5 "PESD3V3U1UB,115" SOD-523 1013,1701 r270 bottom
D6 "PESD3V3U1UB,115" SOD-523 1151,1493 r180 bottom
D8 "SMBJ15CA/TR13" SMB 1423.13,549.1 r180 bottom
D9 "SMBJ15CA/TR13" SMB 1071.13,549.1 r0 bottom
D11 "PESD3V3U1UB,115" PESD3V3U1UB,115 905,1383 r180 bottom
D12 "PESD3V3U1UB,115" PESD3V3U1UB,115 820.96,1540.77 r270 bottom
D13 "NRVBAF440T3G" SMA 355.13,1113.1 r90 top
D14 "PESDSVOL1UB 115" SOD-523 285.13,923.1 r0 top
D15 "PESD3V3U1UB,115" SOD-523 2283,1706.53 r270 bottom
D16 "PESD3V3U1UB,115" SOD-523 2329,1336.53 r90 bottom
D17 "PESD3V3U1UB,115" SOD-523 2503,1538 r180 bottom
D18 "PESD3V3U1UB,115" SOD-523 2503,1581 r180 bottom
D19 "PESD3V3U1UB,115" SOD-523 2365,1701 r270 bottom
D20 "PESD3V3U1UB,115" SOD-523 2503,1493 r180 bottom
D22 "SMBJ15CA/TR13" SMB 2775.13,549.1 r180 bottom
D23 "SMBJ15CA/TR13" SMB 2423.13,549.1 r0 bottom
D25 "PESD3V3U1UB,115" PESD3V3U1UB,115 2257,1383 r180 bottom
D26 "PESD3V3U1UB,115" PESD3V3U1UB,115 2172.96,1540.77 r270 bottom
D27 "PESD3V3U1UB,115" SOD-523 3644,1706.53 r270 bottom
D28 "PESD3V3U1UB,115" SOD-523 3690,1336.53 r90 bottom
D29 "PESD3V3U1UB,115" SOD-523 3864,1538 r180 bottom
D30 "PESD3V3U1UB,115" SOD-523 3864,1581 r180 bottom
D31 "PESD3V3U1UB,115" SOD-523 3726,1701 r270 bottom
D32 "PESD3V3U1UB,115" SOD-523 3864,1493 r180 bottom
D34 "SMBJ15CA/TR13" SMB 4136.13,549.1 r180 bottom
D35 "SMBJ15CA/TR13" SMB 3784.13,549.1 r0 bottom
D37 "PESD3V3U1UB,115" PESD3V3U1UB,115 3618,1383 r180 bottom
D38 "PESD3V3U1UB,115" SOD-523 4966,1706.53 r270 bottom
D39 "PESD3V3U1UB,115" SOD-523 5012,1336.53 r90 bottom
D40 "PESD3V3U1UB,115" SOD-523 5186,1538 r180 bottom
D41 "PESD3V3U1UB,115" SOD-523 5186,1581 r180 bottom
D42 "PESD3V3U1UB,115" SOD-523 5048,1701 r270 bottom
D43 "PESD3V3U1UB,115" SOD-523 5186,1493 r180 bottom
D45 "SMBJ15CA/TR13" SMB 5458.13,549.1 r180 bottom
D46 "SMBJ15CA/TR13" SMB 5106.13,549.1 r0 bottom
D48 "PESD3V3U1UB,115" PESD3V3U1UB,115 4940,1383 r180 bottom
D49 "PESD3V3U1UB,115" SOD-523 4857,1536 r90 bottom
D50 "PESD3V3U1UB,115" SOD-523 2725,3446.87 r90 bottom
D51 "PESD3V3U1UB,115" SOD-523 2695,3809.47 r270 bottom
D52 "PESD3V3U1UB,115" SOD-523 2503.47,3616.17 r0 bottom
D53 "PESD3V3U1UB,115" SOD-523 2502.53,3570 r0 bottom
D54 "PESD3V3U1UB,115" SOD-523 2643,3452.47 r90 bottom
D55 "PESD3V3U1UB,115" SOD-523 2503,3663 r0 bottom
D57 "SMBJ15CA/TR13" SMB 2216.41,4605 r0 bottom
D58 "SMBJ15CA/TR13" SMB 2567.41,4607 r180 bottom
D60 "PESD3V3U1UB,115" PESD3V3U1UB,115 2767.74,3784.5 r0 bottom
D61 "PESD3V3U1UB,115" PESD3V3U1UB,115 2866,3587 r0 bottom
D62 "PESD3V3U1UB,115" SOD-523 4145,3454.87 r90 bottom
D63 "PESD3V3U1UB,115" SOD-523 4115,3817.47 r270 bottom
D64 "PESD3V3U1UB,115" SOD-523 3923.47,3624.17 r0 bottom
D65 "PESD3V3U1UB,115" SOD-523 3922.53,3578 r0 bottom
D66 "PESD3V3U1UB,115" SOD-523 4063,3460.47 r90 bottom
D67 "PESD3V3U1UB,115" SOD-523 3923,3671 r0 bottom
D69 "SMBJ15CA/TR13" SMB 3636.41,4613 r0 bottom
D70 "SMBJ15CA/TR13" SMB 3987.41,4615 r180 bottom
D72 "PESD3V3U1UB,115" PESD3V3U1UB,115 4187.74,3792.5 r0 bottom
D73 "PESD3V3U1UB,115" PESD3V3U1UB,115 4286,3595 r0 bottom
D74 "PESD3V3U1UB,115" SOD-523 5487,3451.87 r90 bottom
D75 "PESD3V3U1UB,115" SOD-523 5457,3814.47 r270 bottom
D76 "PESD3V3U1UB,115" SOD-523 5265.47,3621.17 r0 bottom
D77 "PESD3V3U1UB,115" SOD-523 5264.53,3575 r0 bottom
D78 "PESD3V3U1UB,115" SOD-523 5405,3457.47 r90 bottom
D79 "PESD3V3U1UB,115" SOD-523 5265,3668 r0 bottom
D81 "SMBJ15CA/TR13" SMB 4978.41,4610 r0 bottom
D82 "SMBJ15CA/TR13" SMB 5329.41,4612 r180 bottom
D84 "PESD3V3U1UB,115" PESD3V3U1UB,115 5529.74,3789.5 r0 bottom
D85 "PESD3V3U1UB,115" PESD3V3U1UB,115 5628,3592 r0 bottom
D86 "PESD3V3U1UB,115" SOD-523 1371,3448.87 r90 bottom
D87 "PESD3V3U1UB,115" SOD-523 1341,3811.47 r270 bottom
D88 "PESD3V3U1UB,115" SOD-523 1149.47,3618.17 r0 bottom
D89 "PESD3V3U1UB,115" SOD-523 1148.53,3572 r0 bottom
D90 "PESD3V3U1UB,115" SOD-523 1289,3454.47 r90 bottom
D91 "PESD3V3U1UB,115" SOD-523 1149,3665 r0 bottom
D93 "SMBJ15CA/TR13" SMB 862.41,4607 r0 bottom
D94 "SMBJ15CA/TR13" SMB 1213.41,4609 r180 bottom
D96 "PESD3V3U1UB,115" PESD3V3U1UB,115 1413.74,3786.5 r0 bottom
D97 "PESD3V3U1UB,115" PESD3V3U1UB,115 1512,3589 r0 bottom
D98 "PESD3V3U1UB,115" PESD3V3U1UB,115 3533.96,1540.77 r270 bottom
DC1 "HT396R-3.96-2P" HT396-3.96-2P 168.13,635.1 r270 top locked
J1 "DB9 母头" DB9-RS8R1-2R77 1420.65,304.91 r180 top locked
J3 "5*5" 5*5-SOCKET 971.71,1525.7 r0 top locked
J4 "DB9 母头" DB9-RS8R1-2R77 2764.65,304.91 r180 top locked
J6 "5*5" 5*5-SOCKET 2323.71,1525.7 r0 top
J7 "DB9 母头" DB9-RS8R1-2R77 4108.65,304.91 r180 top locked
J9 "5*5" 5*5-SOCKET 3684.71,1525.7 r0 top
J10 "DB9 母头" DB9-RS8R1-2R77 5452.65,304.91 r180 top locked
J12 "5*5" 5*5-SOCKET 5006.71,1525.7 r0 top
J13 "DB9 母头" DB9-RS8R1-2R77 2213.47,4858.19 r0 top locked
J15 "5*5" 5*5-SOCKET 2683.71,3629.13 r180 top
J16 "DB9 母头" DB9-RS8R1-2R77 3562.6,4861.29 r0 top locked
J17 "5*5" 5*5-SOCKET 4103.71,3637.13 r180 top
J18 "DB9 母头" DB9-RS8R1-2R77 4904.47,4862.19 r0 top locked
J20 "5*5" 5*5-SOCKET 5445.71,3634.13 r180 top
J21 "DB9 母头" DB9-RS8R1-2R77 866.47,4856.19 r0 top locked
J23 "5*5" 5*5-SOCKET 1329.71,3631.13 r180 top locked
L1 "Inductor" 0603L 997,1077 r180 bottom value=600Ω@100MHz
L2 "Inductor" 0603L 899,1291 r0 bottom value=600Ω@100MHz
L3 "Inductor" 0603L 732.96,1536.77 r90 bottom value=600Ω@100MHz
L4 "Inductor" 0603L 2349,1077 r180 bottom value=600Ω@100MHz
L5 "Inductor" 0603L 2251,1291 r0 bottom value=600Ω@100MHz
L6 "Inductor" 0603L 2084.96,1536.77 r90 bottom value=600Ω@100MHz
L7 "Inductor" 0603L 3710,1077 r180 bottom value=600Ω@100MHz
L8 "Inductor" 0603L 3612,1291 r0 bottom value=600Ω@100MHz
L9 "Inductor" 0603L 3445.96,1536.77 r90 bottom value=600Ω@100MHz
L10 "Inductor" 0603L 5032,1077 r180 bottom value=600Ω@100MHz
L11 "Inductor" 0603L 4934,1291 r0 bottom value=600Ω@100MHz
L12 "Inductor" 0603L 4767.96,1536.77 r90 bottom value=600Ω@100MHz
L13 "Inductor" 0603L 2771.74,3878.72 r180 bottom value=600Ω@100MHz
L14 "Inductor" 0603L 2616,4078 r180 bottom value=600Ω@100MHz
L15 "Inductor" 0603L 2870,3490 r180 bottom value=600Ω@100MHz
L16 "Inductor" 0603L 4191.74,3886.72 r180 bottom value=600Ω@100MHz
L17 "Inductor" 0603L 4036,4086 r180 bottom value=600Ω@100MHz
L18 "Inductor" 0603L 4290,3498 r180 bottom value=600Ω@100MHz
L19 "Inductor" 0603L 5533.74,3883.72 r180 bottom value=600Ω@100MHz
L20 "Inductor" 0603L 5378,4083 r180 bottom value=600Ω@100MHz
L21 "Inductor" 0603L 5632,3495 r180 bottom value=600Ω@100MHz
L22 "Inductor" 0603L 1417.74,3880.72 r180 bottom value=600Ω@100MHz
L23 "Inductor" 0603L 1262,4080 r180 bottom value=600Ω@100MHz
L24 "Inductor" 0603L 1516,3492 r180 bottom value=600Ω@100MHz
R1 "100R/0603" "R 0603_L" 1679,1939 r90 bottom
R2 "100R/0603" "R 0603_L" 1506,1939 r90 bottom
R3 "33R/0402" 0402R 1160.9,1696.65 r180 bottom
R4 "10K/0603" "R 0603_L" 1592.12,1913.51 r180 bottom
R5 "10K/0603" "R 0603_L" 1739,1939 r90 bottom
R6 "33R/0402" 0402R 1161.43,1735.65 r180 bottom
R7 "10K/0603" "R 0603_L" 1443,1941 r90 bottom
R9 "33R/0402" 0402R 1296,1394.86 r270 bottom
R10 "33R/0402" 0402R 1493,1394.86 r270 bottom
R11 "33R/0402" 0402R 1335,1394.86 r270 bottom
R12 "33R/0402" 0402R 1161.43,1774.65 r180 bottom
R14 "33R/0402" 0402R 1043,1371 r180 bottom
R15 "0R/0603" "R 0603_L" 1409,1166.59 r0 bottom
R16 "0R/0603" "R 0603_L" 1409,1227.59 r0 bottom
R17 "10K/0402" 0402R 1043,1166 r0 bottom
R18 "0R/0603" "R 0603_L" 312.13,1847.1 r270 top
R19 "100R/0603" "R 0603_L" 3031,1939 r90 bottom
R20 "100R/0603" "R 0603_L" 2858,1939 r90 bottom
R21 "33R/0402" 0402R 2512.9,1696.65 r180 bottom
R22 "10K/0603" "R 0603_L" 2944.12,1913.51 r180 bottom
R23 "10K/0603" "R 0603_L" 3091,1939 r90 bottom
R24 "33R/0402" 0402R 2513.43,1735.65 r180 bottom
R26 "10K/0603" 0603R 2791.12,1940.54 r90 bottom
R27 "33R/0402" 0402R 2648,1394.86 r270 bottom
R28 "33R/0402" 0402R 2845,1394.86 r270 bottom
R29 "33R/0402" 0402R 2687,1394.86 r270 bottom
R30 "33R/0402" 0402R 2513.43,1774.65 r180 bottom
R32 "33R/0402" 0402R 2395,1371 r180 bottom
R33 "0R/0603" "R 0603_L" 2761,1166.59 r0 bottom
R34 "0R/0603" "R 0603_L" 2761,1227.59 r0 bottom
R35 "10K/0402" 0402R 2395,1166 r0 bottom
R36 "100R/0603" "R 0603_L" 4392,1939 r90 bottom
R37 "100R/0603" "R 0603_L" 4219,1939 r90 bottom
R38 "33R/0402" 0402R 3873.9,1696.65 r180 bottom
R39 "10K/0603" "R 0603_L" 4305.12,1913.51 r180 bottom
R40 "10K/0603" "R 0603_L" 4452,1939 r90 bottom
R41 "33R/0402" 0402R 3874.43,1735.65 r180 bottom
R43 "10K/0603" 0603R 4152.12,1940.54 r90 bottom
R44 "33R/0402" 0402R 4009,1394.86 r270 bottom
R45 "33R/0402" 0402R 4206,1394.86 r270 bottom
R46 "33R/0402" 0402R 4048,1394.86 r270 bottom
R47 "33R/0402" 0402R 3874.43,1774.65 r180 bottom
R49 "33R/0402" 0402R 3756,1371 r180 bottom
R50 "0R/0603" "R 0603_L" 4122,1166.59 r0 bottom
R51 "0R/0603" "R 0603_L" 4122,1227.59 r0 bottom
R52 "10K/0402" 0402R 3756,1166 r0 bottom
R53 "100R/0603" "R 0603_L" 5714,1939 r90 bottom
R54 "100R/0603" "R 0603_L" 5541,1939 r90 bottom
R55 "33R/0402" 0402R 5195.9,1696.65 r180 bottom
R56 "10K/0603" "R 0603_L" 5627.12,1913.51 r180 bottom
R57 "33R/0402" 0402R 5196,1736 r180 bottom
R58 "10K/0603" "R 0603_L" 5774,1939 r90 bottom
R60 "10K/0603" 0603R 5474.12,1940.54 r90 bottom
R61 "33R/0402" 0402R 5331,1394.86 r270 bottom
R62 "33R/0402" 0402R 5528,1394.86 r270 bottom
R63 "33R/0402" 0402R 5370,1394.86 r270 bottom
R64 "33R/0402" 0402R 5196.43,1774.65 r180 bottom
R66 "33R/0402" 0402R 5078,1371 r180 bottom
R67 "0R/0603" "R 0603_L" 5444,1166.59 r0 bottom
R68 "0R/0603" "R 0603_L" 5444,1227.59 r0 bottom
R69 "10K/0402" 0402R 5078,1166 r0 bottom
R70 "100R/0603" "R 0603_L" 1973,3178 r270 bottom
R71 "100R/0603" "R 0603_L" 2147,3178 r270 bottom
R72 "33R/0402" 0402R 2498.67,3456.65 r0 bottom
R73 "10K/0603" "R 0603_L" 2061,3203.59 r0 bottom
R74 "10K/0603" "R 0603_L" 1911,3177.59 r270 bottom
R75 "33R/0402" 0402R 2498.14,3417.65 r0 bottom
R77 "10K/0603" "R 0603_L" 2207,3178 r270 bottom
R78 "33R/0402" 0402R 2360.45,3757.65 r90 bottom
R79 "33R/0402" 0402R 2163,3761.65 r90 bottom
R80 "33R/0402" 0402R 2320.45,3757.65 r90 bottom
R81 "33R/0402" 0402R 2498.14,3378.65 r0 bottom
R83 "33R/0402" 0402R 2631,3782 r0 bottom
R84 "0R/0603" "R 0603_L" 2227,4005.42 r180 bottom
R85 "0R/0603" "R 0603_L" 2227,3942.41 r180 bottom
R86 "10K/0402" 0402R 2630,3990 r180 bottom
R87 "100R/0603" "R 0603_L" 3393,3186 r270 bottom
R88 "100R/0603" "R 0603_L" 3567,3186 r270 bottom
R89 "33R/0402" 0402R 3918.67,3464.65 r0 bottom
R90 "10K/0603" "R 0603_L" 3481,3211.59 r0 bottom
R91 "33R/0402" 0402R 3918.14,3425.65 r0 bottom
R92 "10K/0603" "R 0603_L" 3331,3185 r270 bottom
R94 "10K/0603" "R 0603_L" 3627,3186 r270 bottom
R95 "33R/0402" 0402R 3780.45,3765.65 r90 bottom
R96 "33R/0402" 0402R 3583,3769.65 r90 bottom
R97 "33R/0402" 0402R 3740.45,3765.65 r90 bottom
R98 "33R/0402" 0402R 3918.14,3386.65 r0 bottom
R100 "33R/0402" 0402R 4051,3790 r0 bottom
R101 "0R/0603" "R 0603_L" 3647,4013.42 r180 bottom
R102 "0R/0603" "R 0603_L" 3647,3950.41 r180 bottom
R103 "10K/0402" 0402R 4050,3998 r180 bottom
R104 "100R/0603" "R 0603_L" 4735,3183 r270 bottom
R105 "100R/0603" "R 0603_L" 4909,3183 r270 bottom
R106 "33R/0402" 0402R 5260.67,3461.65 r0 bottom
R107 "10K/0603" "R 0603_L" 4823,3208.59 r0 bottom
R108 "10K/0603" "R 0603_L" 4673,3182.59 r270 bottom
R109 "33R/0402" 0402R 5260.14,3422.65 r0 bottom
R111 "10K/0603" "R 0603_L" 4969,3183 r270 bottom
R112 "33R/0402" 0402R 5122.45,3762.65 r90 bottom
R113 "33R/0402" 0402R 4925,3766.65 r90 bottom
R114 "33R/0402" 0402R 5082.45,3762.65 r90 bottom
R115 "33R/0402" 0402R 5260.14,3383.65 r0 bottom
R117 "33R/0402" 0402R 5393,3787 r0 bottom
R118 "0R/0603" "R 0603_L" 4989,4010.42 r180 bottom
R119 "0R/0603" "R 0603_L" 4989,3947.41 r180 bottom
R120 "10K/0402" 0402R 5392,3995 r180 bottom
R121 "100R/0603" "R 0603_L" 619,3180 r270 bottom
R122 "100R/0603" "R 0603_L" 793,3180 r270 bottom
R123 "33R/0402" 0402R 1144.67,3458.65 r0 bottom
R124 "10K/0603" "R 0603_L" 707,3205.59 r0 bottom
R125 "10K/0603" "R 0603_L" 557,3179.59 r270 bottom
R126 "33R/0402" 0402R 1144.14,3419.65 r0 bottom
R128 "10K/0603" "R 0603_L" 853,3180 r270 bottom
R129 "33R/0402" 0402R 1006.45,3759.65 r90 bottom
R130 "33R/0402" 0402R 809,3763.65 r90 bottom
R131 "33R/0402" 0402R 966.45,3759.65 r90 bottom
R132 "33R/0402" 0402R 1144.14,3380.65 r0 bottom
R134 "33R/0402" 0402R 1277,3784 r0 bottom
R135 "0R/0603" "R 0603_L" 873,4007.42 r180 bottom
R136 "0R/0603" "R 0603_L" 873,3944.41 r180 bottom
R137 "10K/0402" 0402R 1276,3992 r180 bottom
T1 "TEST" Test-0.5mm 1199.32,1449.28 r180 bottom
T2 "TEST" TEST#1 886,1677 r90 bottom
T3 "TEST" TEST#1 1567,2019 r90 top
T4 "TEST" TEST#1 1740,2024 r90 top
T5 "TEST" TEST#1 1067,1727 r90 bottom
T6 "TEST" TEST#1 1259,1413 r90 bottom
T7 "TEST" TEST#1 1506,2029 r90 top
T8 "TEST" TEST#1 1454,1379 r90 bottom
T9 "TEST" TEST#1 1373,1379 r90 bottom
T10 "TEST" TEST#1 1145,1813 r90 bottom
T12 "TEST" Test-0.5mm 993.28,1257.68 r90 bottom
T13 "TEST" TEST#2 376.13,773.1 r90 top
T14 "TEST" TEST#2 314.13,1925.1 r90 top
T15 "TEST" TEST#2 1647,2049 r90 top
T16 "TEST" TEST#2 153.13,1646.1 r90 top
T17 "TEST" TEST#2 678,3089 r90 top
T18 "TEST" Test-0.5mm 2551.32,1449.28 r180 bottom
T19 "TEST" TEST#1 2238,1677 r90 bottom
T20 "TEST" TEST#1 2919,2019 r90 top
T21 "TEST" TEST#1 3092,2024 r90 top
T22 "TEST" TEST#1 2419,1727 r90 bottom
T23 "TEST" TEST#1 2611,1413 r90 bottom
T24 "TEST" TEST#1 2858,2029 r90 top
T25 "TEST" TEST#1 2806,1379 r90 bottom
T26 "TEST" TEST#1 2725,1379 r90 bottom
T27 "TEST" TEST#1 2497,1813 r90 bottom
T28 "TEST" TEST#2 2999,2049 r90 top (schematic designator T15)
T29 "TEST" Test-0.5mm 2345.28,1257.68 r90 bottom
T30 "TEST" Test-0.5mm 3912.32,1449.28 r180 bottom
T31 "TEST" TEST#1 3599,1677 r90 bottom
T32 "TEST" TEST#1 4280,2019 r90 top
T33 "TEST" TEST#1 4453,2024 r90 top
T34 "TEST" TEST#1 3780,1727 r90 bottom
T35 "TEST" TEST#1 3972,1413 r90 bottom
T36 "TEST" TEST#1 4219,2029 r90 top
T37 "TEST" TEST#1 4167,1379 r90 bottom
T38 "TEST" TEST#1 4086,1379 r90 bottom
T39 "TEST" TEST#1 3858,1813 r90 bottom
T40 "TEST" TEST#2 4360,2049 r90 top (schematic designator T15)
T41 "TEST" Test-0.5mm 3706.28,1257.68 r90 bottom
T42 "TEST" Test-0.5mm 5234.32,1449.28 r180 bottom
T43 "TEST" TEST#1 4921,1677 r90 bottom
T44 "TEST" TEST#1 5602,2019 r90 top
T45 "TEST" TEST#1 5775,2024 r90 top
T46 "TEST" TEST#1 5102,1727 r90 bottom
T47 "TEST" TEST#1 5294,1413 r90 bottom
T48 "TEST" TEST#1 5541,2029 r90 top
T49 "TEST" TEST#1 5489,1379 r90 bottom
T50 "TEST" TEST#1 5408,1379 r90 bottom
T51 "TEST" TEST#1 5180,1813 r90 bottom
T52 "TEST" TEST#2 5682,2049 r90 top (schematic designator T15)
T53 "TEST" TEST#1 5030.94,1261.94 r90 bottom
T54 "TEST" Test-0.5mm 2450.28,3708.68 r90 bottom
T55 "TEST" TEST#1 2768,3478 r270 bottom
T56 "TEST" TEST#1 2086,3103 r90 top
T57 "TEST" TEST#1 1972,3098 r270 top
T58 "TEST" TEST#1 2595,3389 r180 bottom
T59 "TEST" TEST#1 2457,3859.4 r180 bottom
T60 "TEST" TEST#1 2147,3097 r180 top
T61 "TEST" TEST#1 2201,3778 r180 bottom
T62 "TEST" TEST#1 2285,3778 r180 bottom
T63 "TEST" TEST#1 2578,3344 r180 bottom
T64 "TEST" TEST#2 2032,3087.5 r90 top (schematic designator T15)
T65 "TEST" TEST#1 2680,3896 r270 bottom
T66 "TEST" Test-0.5mm 3870.28,3716.68 r90 bottom
T67 "TEST" TEST#1 4188,3486 r270 bottom
T68 "TEST" TEST#1 3506,3111 r90 top
T69 "TEST" TEST#2 3391,3094 r270 top
T70 "TEST" TEST#1 4015,3397 r180 bottom
T71 "TEST" TEST#2 3882.91,3873.31 r180 bottom
T72 "TEST" TEST#1 3567,3105 r180 top
T73 "TEST" TEST#2 3626.91,3791.91 r180 bottom
T74 "TEST" TEST#1 3705,3786 r180 bottom
T75 "TEST" TEST#1 3998,3352 r180 bottom
T76 "TEST" TEST#2 3452,3095.5 r90 top (schematic designator T15)
T77 "TEST" TEST#1 4100,3904 r270 bottom
T78 "TEST" Test-0.5mm 5212.28,3713.68 r90 bottom
T79 "TEST" TEST#1 5530,3483 r270 bottom
T80 "TEST" TEST#1 4848,3108 r90 top
T81 "TEST" TEST#1 4734,3103 r270 top
T82 "TEST" TEST#1 5357,3394 r180 bottom
T83 "TEST" TEST#1 5219,3864.4 r180 bottom
T84 "TEST" TEST#1 4909,3102 r180 top
T85 "TEST" TEST#1 4963,3783 r180 bottom
T86 "TEST" TEST#1 5047,3783 r180 bottom
T87 "TEST" TEST#1 5340,3349 r180 bottom
T88 "TEST" TEST#2 4794,3092.5 r90 top (schematic designator T15)
T89 "TEST" TEST#1 5442,3901 r270 bottom
T90 "TEST" Test-0.5mm 1096.28,3710.68 r90 bottom
T91 "TEST" TEST#1 1414,3480 r270 bottom
T92 "TEST" TEST#1 732,3105 r90 top
T93 "TEST" TEST#1 618,3100 r270 top
T94 "TEST" TEST#1 1241,3391 r180 bottom
T95 "TEST" TEST#1 1103,3861.4 r180 bottom
T96 "TEST" TEST#1 793,3099 r180 top
T97 "TEST" TEST#1 847,3780 r180 bottom
T98 "TEST" TEST#1 931,3780 r180 bottom
T99 "TEST" TEST#1 1224,3346 r180 bottom
T101 "TEST" TEST#1 1326,3898 r270 bottom
T135 "TEST" Test-0.5mm 1182.28,1812.68 r90 bottom
T136 "TEST" Test-0.5mm 2534.28,1812.68 r90 bottom
T137 "TEST" Test-0.5mm 3895.28,1812.68 r90 bottom
T138 "TEST" Test-0.5mm 5217.28,1812.68 r90 bottom
T139 "TEST" Test-0.5mm 2496.28,3335.68 r90 bottom
T140 "TEST" Test-0.5mm 3916.28,3343.68 r90 bottom
T141 "TEST" Test-0.5mm 5258.28,3340.68 r90 bottom
T142 "TEST" Test-0.5mm 1142.28,3337.68 r90 bottom
U1 "FS32K144HAT0MLFT" LQFP48_7X7 1424.13,1648.1 r180 bottom
U2 "TRS3232EQPWRQ1" TSSOP16_640X500 1640,1204 r180 bottom
U3 "GT25C512-2UDL1-TR" GT25C512-2UDLA2-TR 1056.65,1265.29 r270 bottom
U4 "TLS205B0LDV33XUMA1" SON50P330X330X110-11N 291.81,1538.1 r270 top
U5 "FS32K144HAT0MLFT" LQFP48_7X7 2776.13,1648.1 r180 bottom
U6 "TRS3232EQPWRQ1" TSSOP16_640X500 2992,1204 r180 bottom
U7 "GT25C512-2UDL1-TR" GT25C512-2UDLA2-TR 2408.65,1265.29 r270 bottom
U8 "FS32K144HAT0MLFT" LQFP48_7X7 4137.13,1648.1 r180 bottom
U9 "TRS3232EQPWRQ1" TSSOP16_640X500 4353,1204 r180 bottom
U10 "GT25C512-2UDL1-TR" GT25C512-2UDLA2-TR 3769.65,1265.29 r270 bottom
U11 "FS32K144HAT0MLFT" LQFP48_7X7 5459.13,1648.1 r180 bottom
U12 "TRS3232EQPWRQ1" TSSOP16_640X500 5675,1204 r180 bottom
U13 "GT25C512-2UDL1-TR" GT25C512-2UDLA2-TR 5091.65,1265.29 r270 bottom
U14 "FS32K144HAT0MLFT" LQFP48_7X7 2231.87,3506.33 r0 bottom
U15 "TRS3232EQPWRQ1" TSSOP16_640X500 2006,3967 r0 bottom
U16 "GT25C512-2UDL1-TR" GT25C512-2UDLA2-TR 2616.75,3891.11 r90 bottom
U17 "FS32K144HAT0MLFT" LQFP48_7X7 3651.87,3514.33 r0 bottom
U18 "TRS3232EQPWRQ1" TSSOP16_640X500 3426,3975 r0 bottom
U19 "GT25C512-2UDL1-TR" GT25C512-2UDLA2-TR 4036.75,3899.11 r90 bottom
U20 "FS32K144HAT0MLFT" LQFP48_7X7 4993.87,3511.33 r0 bottom
U21 "TRS3232EQPWRQ1" TSSOP16_640X500 4768,3972 r0 bottom
U22 "GT25C512-2UDL1-TR" GT25C512-2UDLA2-TR 5378.75,3896.11 r90 bottom
U23 "FS32K144HAT0MLFT" LQFP48_7X7 877.87,3508.33 r0 bottom
U24 "TRS3232EQPWRQ1" TSSOP16_640X500 652,3969 r0 bottom
U25 "GT25C512-2UDL1-TR" GT25C512-2UDLA2-TR 1262.75,3893.11 r90 bottom
Y1 "ECS-240-10-37Q-ES-TR" ECS2401037QESTR 1708,1590.5 r90 bottom
Y2 "ECS-240-10-37Q-ES-TR" ECS2401037QESTR 3060,1590.5 r90 bottom
Y3 "ECS-240-10-37Q-ES-TR" ECS2401037QESTR 4421,1590.5 r90 bottom
Y4 "ECS-240-10-37Q-ES-TR" ECS2401037QESTR 5743,1590.5 r90 bottom
Y5 "ECS-240-10-37Q-ES-TR" ECS2401037QESTR 1941,3563 r270 bottom
Y6 "ECS-240-10-37Q-ES-TR" ECS2401037QESTR 3361,3571 r270 bottom
Y7 "ECS-240-10-37Q-ES-TR" ECS2401037QESTR 4703,3568 r270 bottom
Y8 "ECS-240-10-37Q-ES-TR" ECS2401037QESTR 587,3565 r270 bottom

## Footprints (in the part's own frame and the unit in brackets; to place one, negate y for a bottom-side part, rotate by r counter-clockwise, add the part's x,y. Pads: shape width x height; smd on the part's side, far side on the other; paste and mask are expansions set on the pad)
5*5-SOCKET [mm]
  round 5 hole 2.5: 0(-7.5,-12.5) 0(-7.5,12.5) 0(7.5,-12.5) 0(7.5,12.5)
  round 1.7 hole 1.7: 0(-5,9) 0(5,-9)
  rrect50% 0.9x0.45 smd: 1(2.05,1.05)
  rect 0.9x0.45 smd: 2(2.05,0.35) 3(2.05,-0.35) 4(2.05,-1.05) 9(-2.05,-1.05) 10(-2.05,-0.35) 11(-2.05,0.35) 12(-2.05,1.05)
  rect 0.45x0.9 smd: 5(1.05,-2.05) 6(0.35,-2.05) 7(-0.35,-2.05) 8(-1.05,-2.05) 13(-1.05,2.05) 14(-0.35,2.05) 15(0.35,2.05) 16(1.05,2.05)
  rect 0.9x0.9 smd: 17(2.05,2.05) 18(2.05,-2.05) 19(-2.05,-2.05) 20(-2.05,2.05)
  silkscreen extent -10.3,-21.8 11.47,21.8, body extent -2.5,-2.5 2.5,2.5, height 0.1
0402C [mm]
  rect 0.51x0.51 smd: 1(-0.41,0) 2(0.41,0)
  silkscreen extent -0.86,-0.44 0.86,0.45, body extent -0.5,-0.3 0.5,0.3, height 0.2
0402R [mm]
  rect 0.51x0.51 smd: 1(-0.41,0) 2(0.41,0)
  silkscreen extent -0.85,-0.44 0.86,0.45, body extent -0.5,-0.3 0.5,0.3, height 0.2
0603L [mm]
  rect 0.76x0.8 smd: 1(-0.76,0) 2(0.76,0)
  silkscreen extent -1.35,-0.62 1.35,0.61, body extent -0.8,-0.4 0.8,0.4, height 0.4
0603R [mm]
  rect 0.76x0.8 smd: 1(-0.76,0) 2(0.76,0)
  silkscreen extent -1.35,-0.61 1.35,0.62, body extent -0.8,-0.41 0.8,0.41, height 0.45
"C 0402_L" [mm] "无极性贴片电容         淘宝ID:黄晶宝石"
  rect 0.5x0.5 smd: 1(-0.45,0) 2(0.45,0)
  silkscreen extent -0.85,-0.45 0.85,0.45, body extent -0.5,-0.26 0.5,0.26, height 0.53
"C 0603_L" [mil] "无极性贴片电容                                       淘宝ID:黄晶宝石"
  rect 30x30 smd: 1(-25.59,0) 2(25.59,0)
  silkscreen extent -51,-26 51,26, body extent -31,-16 31,16, height 32
DB9-RS8R1-2R77 [mm]
  rect 1.6x1.6 hole 1: 1(0,0)
  round 1.6 hole 1: 2(2.77,0) 3(5.54,0) 4(8.31,0) 5(11.08,0) 6(1.385,2.84) 7(4.155,2.84) 8(6.925,2.84) 9(9.695,2.84)
  round 4.5 hole 3.2: ""(-6.955,1.42) ""(18.035,1.42)
  silkscreen extent -9.86,-1.91 20.94,16.67, body extent -9.99,-2.18 21.11,16.81, height 12.44
ECS2401037QESTR [mm]
  rect 0.85x0.75 smd: 1(-0.675,-0.525) 2(0.675,-0.525) 3(0.675,0.525) 4(-0.675,0.525)
  silkscreen extent -1.27,-1.32 1.27,1.02, body extent -1.02,-0.82 1.02,0.82, height 0.65
GT25C512-2UDLA2-TR [mil]
  rect 19.9x11 smd: 1(-56.11,29.65) 2(-56.11,9.95) 3(-56.11,-9.75) 4(-56.11,-29.45) 5(56.29,-29.45) 6(56.29,-9.75) 7(56.29,9.95) 8(56.29,29.65)
  rect 55.1x63 smd: 9(0.09,0.15)
  silkscreen extent -81,-42 62,42, body extent -75,-45 76,45, height 63
HT396-3.96-2P [mm]
  round 2.3 hole 1.5: 1(1.98,0) 2(-1.98,0)
  silkscreen extent -3.96,-9.6 3.96,0.51, body extent -3.94,-9.62 3.98,0.48, height 7.5
LQFP48_7X7 [mm]
  rect 1.45x0.3 smd: 1(-4.225,2.75) 2(-4.225,2.25) 3(-4.225,1.75) 4(-4.225,1.25) 5(-4.225,0.75) 6(-4.225,0.25) 7(-4.225,-0.25) 8(-4.225,-0.75) 9(-4.225,-1.25) 10(-4.225,-1.75) 11(-4.225,-2.25) 12(-4.225,-2.75) 25(4.225,-2.75) 26(4.225,-2.25) 27(4.225,-1.75) 28(4.225,-1.25) 29(4.225,-0.75) 30(4.225,-0.25) 31(4.225,0.25) 32(4.225,0.75) 33(4.225,1.25) 34(4.225,1.75) 35(4.225,2.25) 36(4.225,2.75)
  rect 0.3x1.45 smd: 13(-2.75,-4.225) 14(-2.25,-4.225) 15(-1.75,-4.225) 16(-1.25,-4.225) 17(-0.75,-4.225) 18(-0.25,-4.225) 19(0.25,-4.225) 20(0.75,-4.225) 21(1.25,-4.225) 22(1.75,-4.225) 23(2.25,-4.225) 24(2.75,-4.225) 37(2.75,4.225) 38(2.25,4.225) 39(1.75,4.225) 40(1.25,4.225) 41(0.75,4.225) 42(0.25,4.225) 43(-0.25,4.225) 44(-0.75,4.225) 45(-1.25,4.225) 46(-1.75,4.225) 47(-2.25,4.225) 48(-2.75,4.225)
  silkscreen extent -4.83,-3.15 3.15,3.62, body extent -4.5,-4.5 4.5,4.5, height 1.6
PESD3V3U1UB,115 [mm]
  rect 0.6x0.5 smd: 1(0.846,-0.026)
  oct 0.6x0.5 smd: 2(-0.654,-0.026)
  silkscreen extent -1.12,-0.48 1.34,0.43, body extent -0.7,-0.43 0.9,0.37, height 0.65
"R 0603_L" [mil] "1/10W贴片电阻                 淘宝ID:黄晶宝石"
  rect 30x30 smd: 1(-25.59,0) 2(25.59,0)
  silkscreen extent -51,-26 51,26, body extent -31,-16 31,16, height 16
SMA [mm] "4.5x2.6*2.2mm（长宽高，不包括引脚）"
  rect 2.2x1.75 smd: 1(-2.3,0) 2(2.3,0)
  silkscreen extent -2.7,-1.52 3.56,1.52, body extent -2.53,-1.3 2.58,1.3, height 2.15
SMB [mm] "4.7*3.9*2.2mm(长宽高，不包括引脚）"
  rect 2.5x2.2 smd: 1(-2.35,0) 2(2.35,0)
  silkscreen extent -2.8,-1.9 2.8,1.9, body extent -2.63,-1.8 2.67,1.8, height 2.35
SOD-523 [mm] "1.2x0.8X0.6mm（长宽高，不包括引脚）"
  rect 0.6x0.5 smd: 1(-0.75,0)
  oct 0.6x0.5 smd: 2(0.75,0)
  silkscreen extent -1.24,-0.46 1.22,0.46, body extent -0.8,-0.4 0.8,0.4, height 0.65
SON50P330X330X110-11N [mm]
  rect 1x0.3 smd: 1(-1.5,1.008) 2(-1.5,0.508) 3(-1.5,0.008) 4(-1.5,-0.492) 5(-1.5,-0.992) 6(1.5,-0.992) 7(1.5,-0.492) 8(1.5,0.008) 9(1.5,0.508) 10(1.5,1.008)
  rect 1.58x2.68 smd: 11(0,0.008)
  silkscreen extent -2.25,-1.78 2.25,1.96, body extent -1.7,-1.64 1.7,1.66, height 1.1
TEST#1 [mm]
  round 0.7 smd paste-1.016: 1(0,0)
TEST#2 [mm]
  round 1 smd paste-1.016: 1(0,0)
Test-0.5mm [mm]
  round 0.5 smd paste-1.016: 1(0.008,-0.033)
TSSOP16_640X500 [mil]
  oval 68.2x13.5 smd: 1(-112.8,89.6) 2(-112.8,64) 3(-112.8,38.4) 4(-112.8,12.8) 5(-112.8,-12.8) 6(-112.8,-38.4) 7(-112.8,-64) 8(-112.8,-89.6) 9(112.8,-89.6) 10(112.8,-64) 11(112.8,-38.4) 12(112.8,-12.8) 13(112.8,12.8) 14(112.8,38.4) 15(112.8,64) 16(112.8,89.6)
  silkscreen extent -119,-101 70,120, body extent -153,-104 149,126, height 150

## Part data
C1 C17 C18 C19 C20 C21 C23 C39 C55 C71 C87 C103 C119: library part Cap, "SMD/SMT 10UF 16V 20% 0603", LatestRevisionDate=17-Jul-2002, LatestRevisionNote="Re-released for DXP Platform.", PackageDescription="Radial Cap, Thru-Hole; 2 Leads; 0.3 in Pin Spacing", PackageReference=RAD-0.3, Published=8-Jun-2000, Publisher="Altium Limited"
C2 C3 C4 C5 C6 C7 C8 C22 C24 C25 C26 C27 C28 C29 C30 C40 C41 C42 C43 C44 C45 C46 C56 C57 C58 C59 C60 C61 C62 C72 C73 C74 C75 C76 C77 C78 C88 C89 C90 C91 C92 C93 C94 C104 C105 C106 C107 C108 C109 C110 C120 C121 C122 C123 C124 C125 C126: library part 0402Capacitor, "Capacitor", Manufacturer_Name="Murata Electronics", Manufacturer_Part_Number=GCM155R71C104KA55D, Mouser2 Part Number=81-GCM155R71C104KA5D, Datasheet Link=https://componentsearchengine.com//GCM155R71C104KA55D.pdf, Height=0.55mm, Mouser2 Price/Stock=https://www.mouser.com/Search/Refine.aspx?Keyword=81-GCM155R71C104KA5D
C9 C10 C12 C13 C14 C15 C16 C31 C32 C33 C34 C35 C36 C37 C38 C52 C53 C54 C68 C69 C70 C84 C85 C86 C100 C101 C102 C116 C117 C118 C132 C133 C134: library part Cap, "'100nF/16V/10%/ 0402/X7R / -55℃ ～ 125℃/AEC-Q200", LatestRevisionDate=17-Jul-2002, LatestRevisionNote="Re-released for DXP Platform.", PackageDescription="Radial Cap, Thru-Hole; 2 Leads; 0.3 in Pin Spacing", PackageReference=RAD-0.3, Published=8-Jun-2000, Publisher="Altium Limited"
C11 C47 C48 C49 C50 C51 C63 C64 C65 C66 C67 C79 C80 C81 C82 C83 C95 C96 C97 C98 C99 C111 C112 C113 C114 C115 C127 C128 C129 C130 C131: "'100nF/16V/10%/ 0402/X7R / -55℃ ～ 125℃/AEC-Q200", LatestRevisionDate=17-Jul-2002, LatestRevisionNote="Re-released for DXP Platform.", PackageDescription="Radial Cap, Thru-Hole; 2 Leads; 0.3 in Pin Spacing", PackageReference=RAD-0.3, Published=8-Jun-2000, Publisher="Altium Limited"
D1 D2 D3 D4 D5 D6 D11 D12 D15 D16 D17 D18 D19 D20 D25 D26 D27 D28 D29 D30 D31 D32 D37 D38 D39 D40 D41 D42 D43 D48 D49 D50 D51 D52 D53 D54 D55 D60 D61 D62 D63 D64 D65 D66 D67 D72 D73 D74 D75 D76 D77 D78 D79 D84 D85 D86 D87 D88 D89 D90 D91 D96 D97 D98: library part SMBJ36CA, "双向TVS管；600W表面贴装瞬态电压抑制器,工作电压36V，SMB_DO-214AA封装 DIODES"
D8 D9 D22 D23 D34 D35 D45 D46 D57 D58 D69 D70 D81 D82 D93 D94: library part SMBJ15CA/TR13_C78410, Breakdown Voltage=16.7V, JLCPCB Part Class="Extended Part", LCSC Part Name="双向 15V截止 24.6A峰值脉冲", Manufacturer=Brightking(君耀电子), Maximum Clamping Voltage=24.4V, Peak Pulse Current (Ipp)@10/1000us=24.6A, Peak Pulse Power Dissipation (Ppp)@10/1000us=600W, Reverse Stand-Off Voltage (Vrwm)=15V, Add into BOM=yes, Convert to PCB=yes, Datasheet=https://atta.szlcsc.com/upload/public/pdf/source/20181127/C309995_EB3DFB9F9AEE5D2146ECD9FA5992A402.pdf, Device=SMBJ15CA/TR13_C78410, Manufacturer Part=SMBJ15CA/TR13, polarity=双向, Supplier=LCSC, Supplier Footprint=SMB(DO-214AA), Supplier Part=C78410, Symbol=SMBJ15CA-C78410, Type=TVS
D13: library part SS14_C2480, Average Rectified Current (Io)=1A, Forward Voltage (Vf@If)=550mV@1A, JLCPCB Part Class="Basic Part", LCSC Part Name="电压:40V 电流:1A", Manufacturer=MDD, Manufacturer Part=SS14, Reverse Leakage Current (Ir)=500uA@40V, Reverse Voltage (Vr)=40V, Add into BOM=yes, Convert to PCB=yes, Datasheet=https://atta.szlcsc.com/upload/public/pdf/source/20230712/2DB6064CFBB99DE6DB116BEE8208BE66.pdf, Device=SS14_C2480, Diode Configuration=独立式, Supplier=LCSC, Supplier Footprint=SMA(DO-214AC), Supplier Part=C2480, Symbol=SS14
D14: library part PESD5V0L1UB,115, "Diode ESD (Uni-directional)", Manufacturer_Name=Nexperia, Datasheet Link=https://assets.nexperia.com/documents/data-sheet/PESD5V0L1UB.pdf, Height=0.65mm, Manufacturer_Part_Number=PESD5V0L1UB,115
DC1: library part DC005, Current Rating (Max)=500mA, JLCPCB Part Class="Extended Part", LCSC Part Name="DC电源插座 内径:2mm 外径:6.3mm", Manufacturer="SHOU HAN(首韩)", Operating Temperature Range=-40℃~+55℃, Voltage Rating (Max)=30V, Add into BOM=yes, Connector Type=DC电源插座, Convert to PCB=yes, Datasheet=https://atta.szlcsc.com/upload/public/pdf/source/20190925/C431533_4751811035784AC1D38EBC85F7905E99.pdf, Device=DC005, Inside Contact Diameter=2mm, Manufacturer Part=DC005, Mounting Style=弯插, Outside Contact Diameter=6.3mm, Supplier=LCSC, Supplier Footprint=插件, Supplier Part=C431533, Symbol=DC005_C431533
J1 J4 J7 J10 J13 J16 J18 J21: library part DB9
R1 R2 R15 R16 R19 R20 R33 R34 R36 R37 R50 R51 R53 R54 R67 R68 R70 R71 R84 R85 R87 R88 R101 R102 R104 R105 R118 R119 R121 R122 R135 R136: library part 0402
R3 R4 R5 R6 R7 R9 R10 R11 R12 R14 R17 R18 R21 R22 R23 R24 R26 R27 R28 R29 R30 R32 R35 R38 R39 R40 R41 R43 R44 R45 R46 R47 R49 R52 R55 R56 R57 R58 R60 R61 R62 R63 R64 R66 R69 R72 R73 R74 R75 R77 R78 R79 R80 R81 R83 R86 R89 R90 R91 R92 R94 R95 R96 R97 R98 R100 R103 R106 R107 R108 R109 R111 R112 R113 R114 R115 R117 R120 R123 R124 R125 R126 R128 R129 R130 R131 R132 R134 R137: library part 0402Resistor, "Resistor", Manufacturer_Name="KOA Speer", Manufacturer_Part_Number=RN73H1ETTP1002F50, Datasheet Link=https://www.mouser.fr/datasheet/2/219/RN73H-12200.pdf, Height=0.4mm
U1 U5 U8 U11 U14 U17 U20 U23: "Integrated Circuit", Manufacturer_Name=NXP, Datasheet Link=http://www.nxp.com/docs/en/data-sheet/S32K-DS.pdf, Height=1.6mm, Manufacturer_Part_Number=FS32K144HAT0MLFT
U3 U7 U10 U13 U16 U19 U22 U25: library part GT25C512-2UDLA2-TR
U4: "Integrated Circuit", Manufacturer_Name=Infineon, ComponentLink1Description="New link", Datasheet Link=https://www.mouser.de/datasheet/2/196/Infineon-TLS203B0-DS-v01_20-EN-1149982.pdf, Height=1.1mm, Manufacturer_Part_Number=TLS205B0LDV33XUMA1
Y1 Y2 Y3 Y4 Y5 Y6 Y7 Y8: "Crystal or Oscillator", Manufacturer_Name=ECS, Datasheet Link=https://www.ecsxtal.com/store/pdf/ECX-1637Q.pdf, Height=0.55mm, Manufacturer_Part_Number=ECS-240-10-37Q-ES-TR
L1 L2 L3 L4 L5 L6 L7 L8 L9 L10 L11 L12 L13 L14 L15 L16 L17 L18 L19 L20 L21 L22 L23 L24: Code_IEC=1005, Code_JEITA=0402, LatestRevisionDate=29-May-2009, LatestRevisionNote="IPC-7351 Footprint Added.", PackageDescription="Chip Inductor", PackageReference=0402-A, Published=8-Jun-2000, Publisher="Altium Limited"

## Free pads (board coordinates)
  round 255.91 hole 118.11: 2(198,4959.78) 2(198,196) 2(198,2558.2) 2(3150.76,707.81) 2(3150.76,2577.89) 2(3150.76,4447.97) 2(4440.63,707.81) 2(6182.25,196) 2(6182.25,2558.2) 2(6182.25,4959.78)

## Via types
v1: diameter 16, hole 8, Top to Bottom, tented both sides, 749 vias

## Nets (pads, with @x,y where several pads share a name; then routed paths per layer and width w, separated by ;. In a path a pad name is that pad's centre, name@x,y a point inside that pad or via, vN(x,y) a via of type N, cw(c..) or ccw(c..) an arc to the next point about the centre after c; other vN are vias at no path point)
AUX1_1: J3.4
AUX1_2: J6.4
AUX1_3: J9.4
AUX1_4: J12.4
AUX1_5: J15.4
AUX1_6: J17.4
AUX1_7: J20.4
AUX1_8: J23.4
AUX2_1: J3.5
AUX2_2: J6.5
AUX2_3: J9.5
AUX2_4: J12.5
AUX2_5: J15.5
AUX2_6: J17.5
AUX2_7: J20.5
AUX2_8: J23.5
AUX3_1: J3.14
AUX3_2: J6.14
AUX3_3: J9.14
AUX3_4: J12.14
AUX3_5: J15.14
AUX3_6: J17.14
AUX3_7: J20.14
AUX3_8: J23.14
AUX4_1: J3.15
AUX4_2: J6.15
AUX4_3: J9.15
AUX4_4: J12.15
AUX4_5: J15.15
AUX4_6: J17.15
AUX4_7: J20.15
AUX4_8: J23.15
EXTALA1: C7.2 U1.8 Y1.3 | length 221.6
  Bottom w6: U1.8@1590.46,1618.57 1634.43,1618.57 1662,1591 1725.15,1591 1728.67,1594.51 Y1.3@1728.67,1617.07 C7.2@1728.67,1665
EXTALA2: C29.2 U5.8 Y2.3 | length 221.6
  Bottom w6: U5.8@2942.46,1618.57 2986.43,1618.57 3014,1591 3077.15,1591 3080.67,1594.51 Y2.3@3080.67,1617.07 C29.2@3080.67,1665
EXTALA3: C45.2 U8.8 Y3.3 | length 221.6
  Bottom w6: U8.8@4303.46,1618.57 4347.43,1618.57 4375,1591 4438.15,1591 4441.67,1594.51 Y3.3@4441.67,1617.07 C45.2@4441.67,1665
EXTALA4: C61.2 U11.8 Y4.3 | length 221.6
  Bottom w6: U11.8@5625.46,1618.57 5669.43,1618.57 5697,1591 5760.15,1591 5763.67,1594.51 Y4.3@5763.67,1617.07 C61.2@5763.67,1665
EXTALA5: C77.2 U14.8 Y5.3 | length 231.2
  Bottom w6: C77.2@1920,3485 1920,3536.09 Y5.3@1920.33,3536.43 1920.33,3558.49 1924,3562.16 1994.84,3562.16 2021,3536 U14.8@2065.54,3536
EXTALA6: C93.2 U17.8 Y6.3 | length 231.2
  Bottom w6: C93.2@3340,3493 3340,3544.09 Y6.3@3340.33,3544.43 3340.33,3566.49 3344,3570.16 3414.84,3570.16 3441,3544 U17.8@3485.54,3544
EXTALA7: C109.2 U20.8 Y7.3 | length 231.2
  Bottom w6: C109.2@4682,3490 4682,3541.09 Y7.3@4682.33,3541.43 4682.33,3563.49 4686,3567.16 4756.84,3567.16 4783,3541 U20.8@4827.54,3541
EXTALA8: C125.2 U23.8 Y8.3 | length 231.2
  Bottom w6: C125.2@566,3487 566,3538.09 Y8.3@566.33,3538.43 566.33,3560.49 570,3564.16 640.84,3564.16 667,3538 U23.8@711.54,3538